# Altium PCB SG2002_work_174.PcbDoc (part 1 of 2)
Units mm, origin at the board's own origin, x right, y up, seen from the top; angles counter-clockwise.
Board outline 38 x 38 mm, 4 copper layers (TOP, GND, POWER, BOTTOM), stack 0.732 mm thick; 197 components, 122 nets, 613 pads, 461 vias.
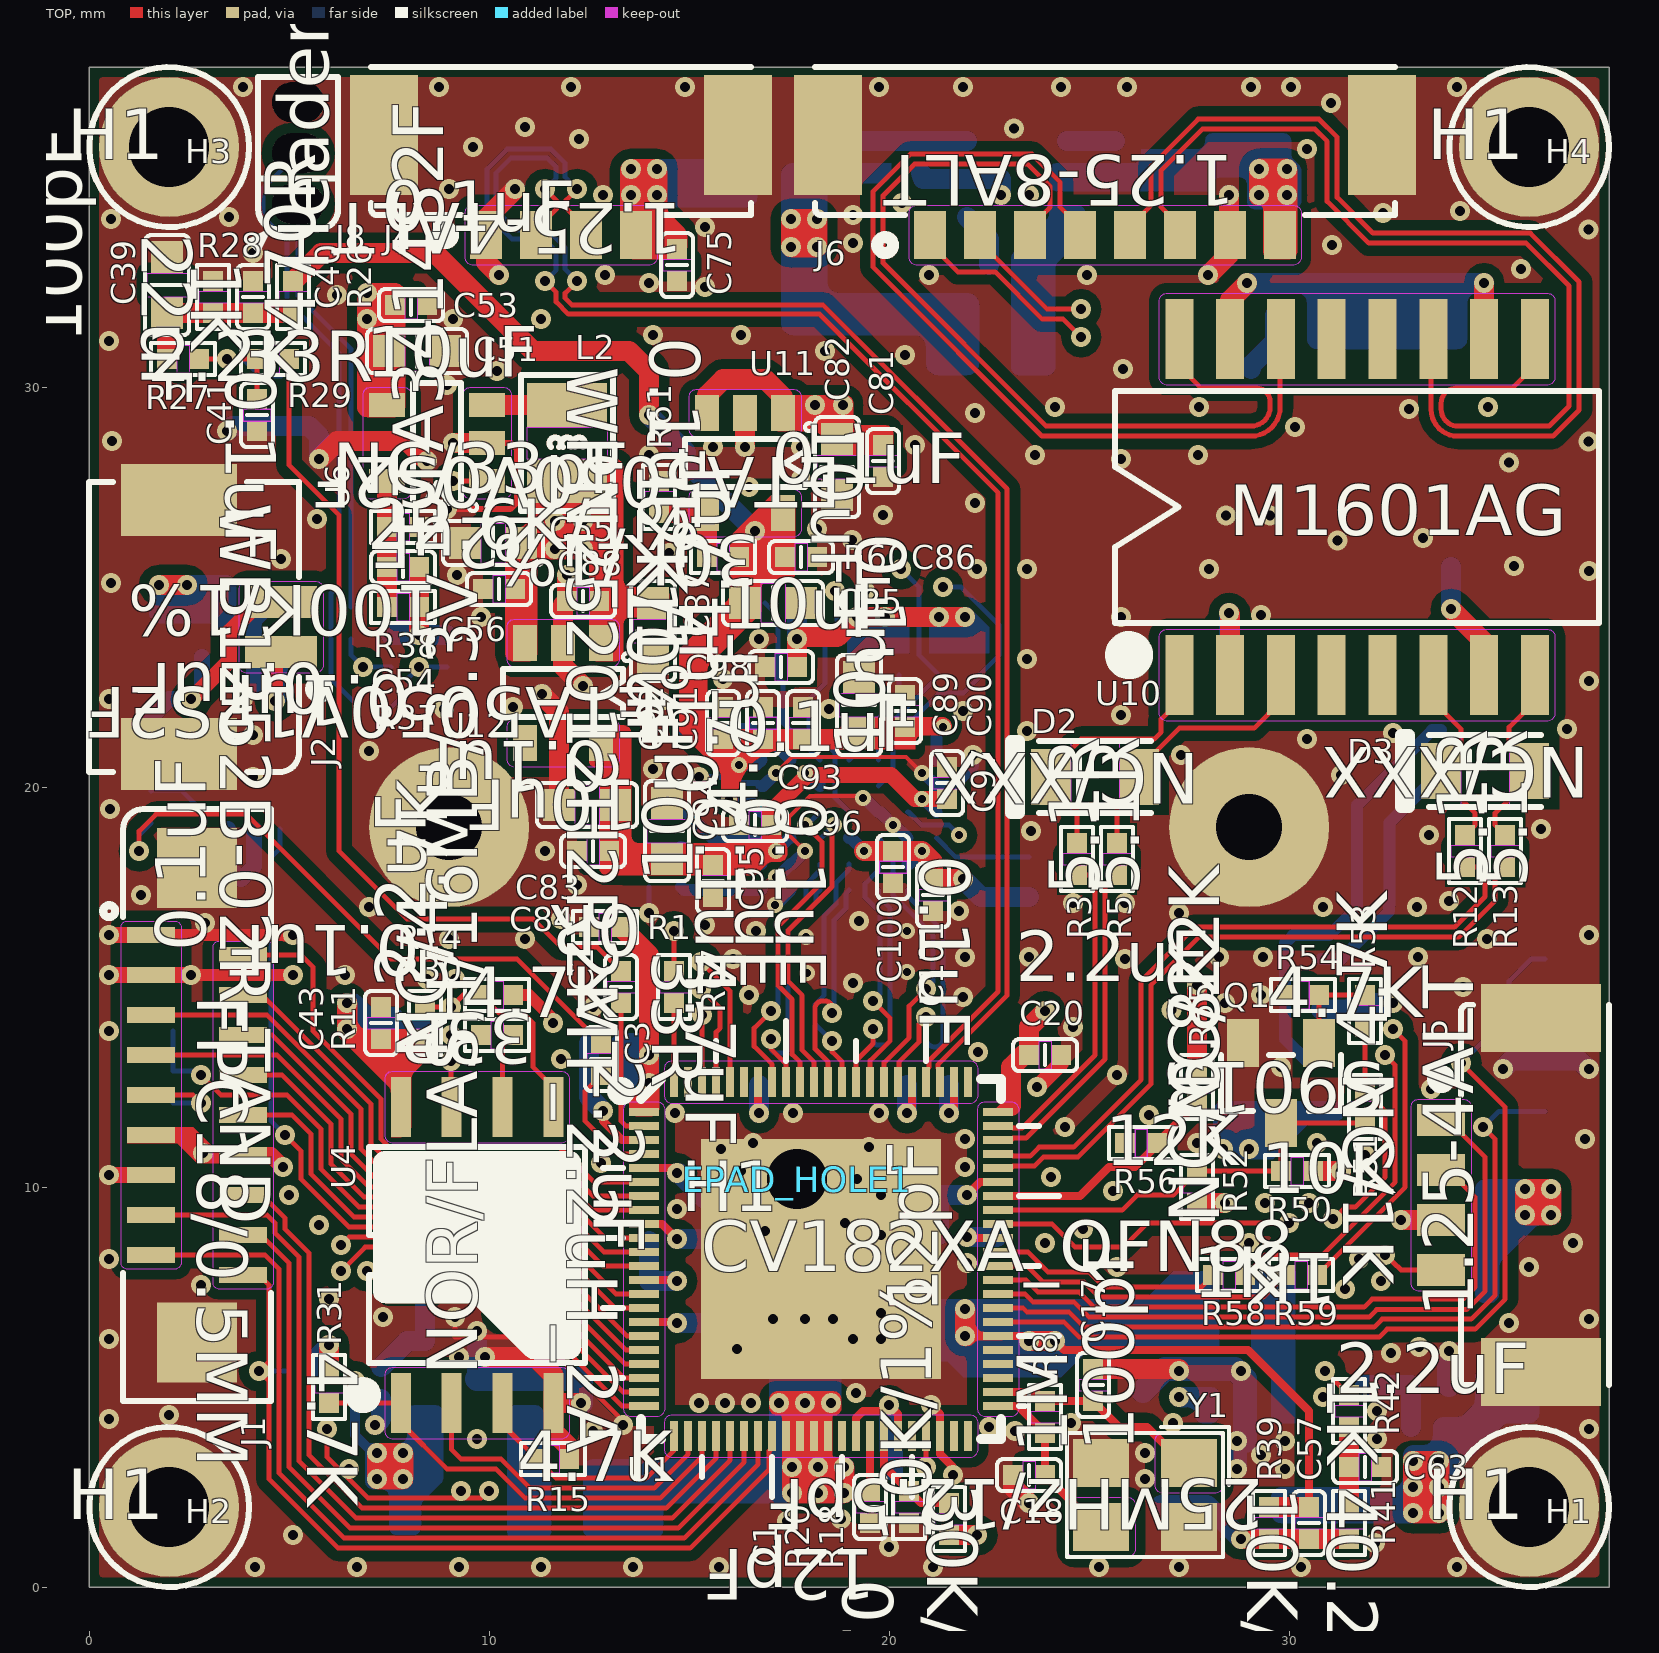
[diagram p0: TOP view]
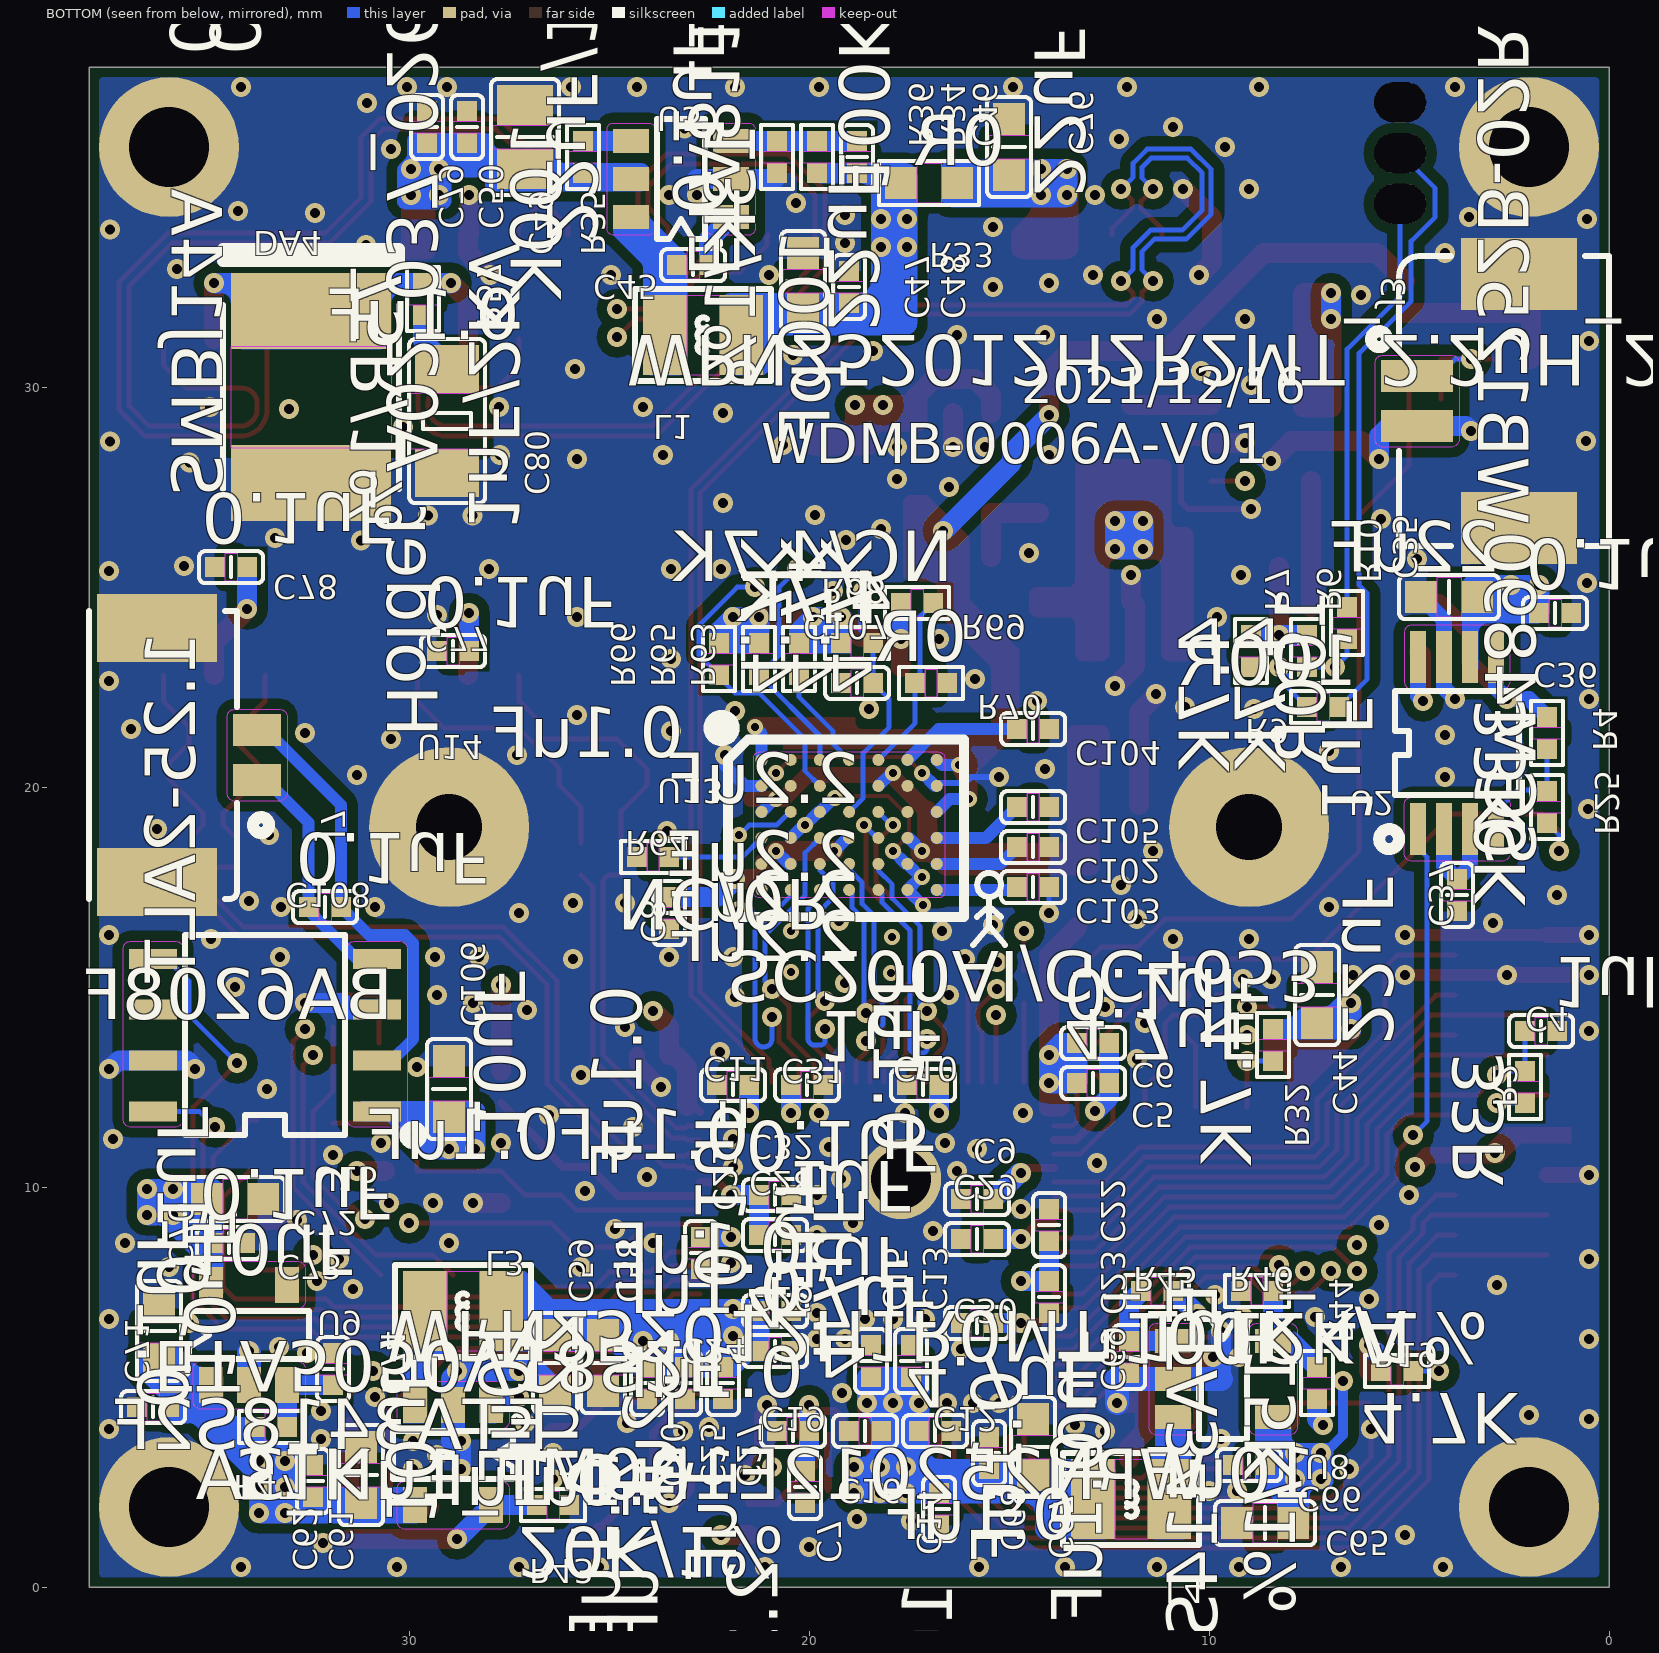
[diagram p1: BOTTOM view, seen from below]
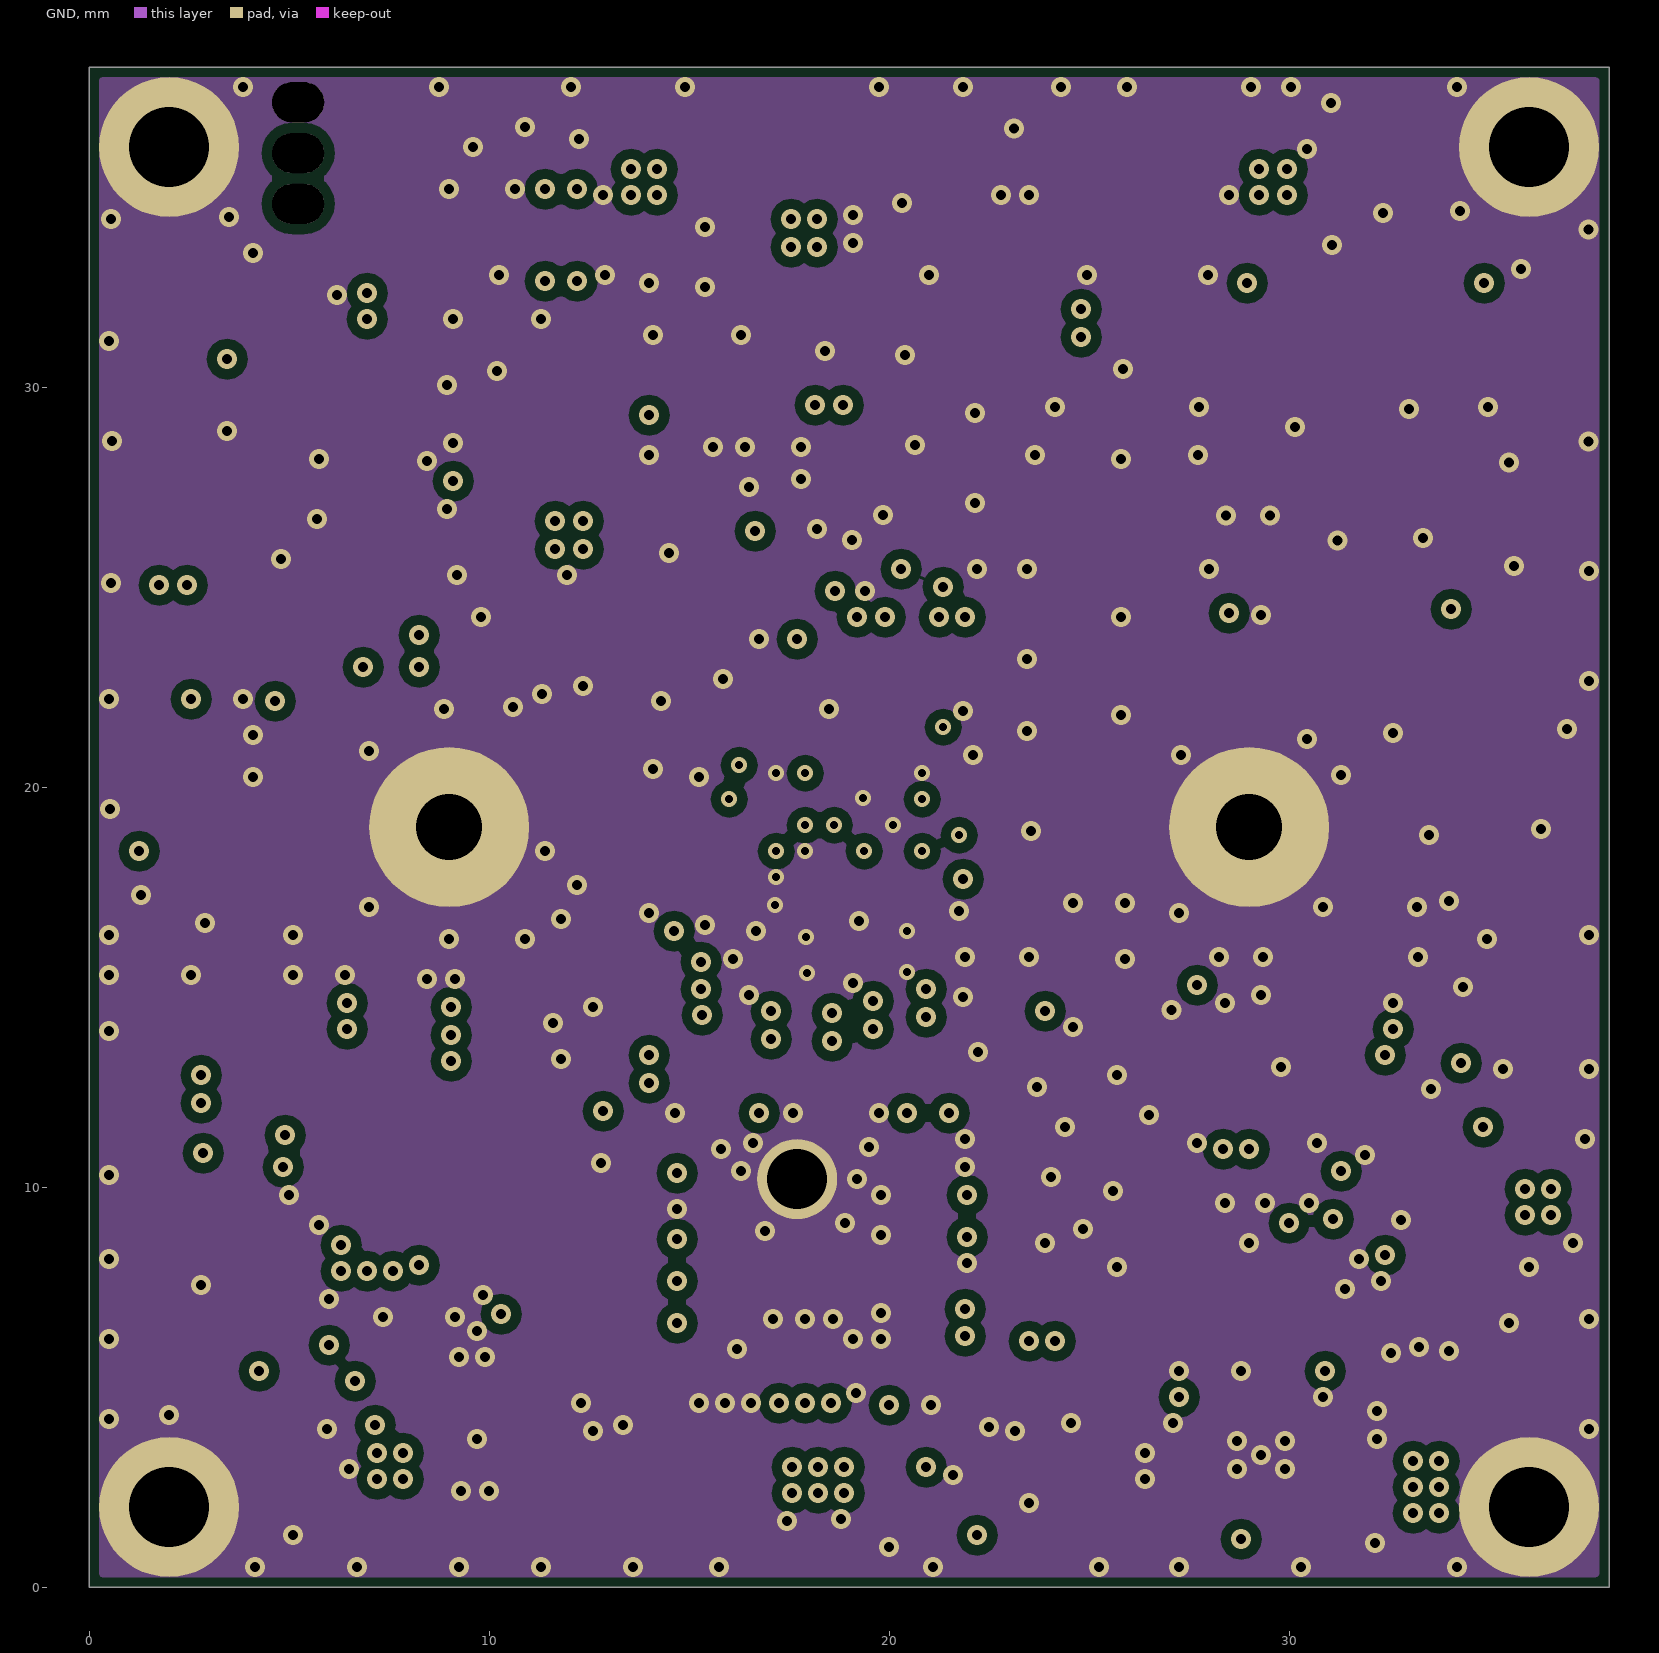
[diagram p2: GND]
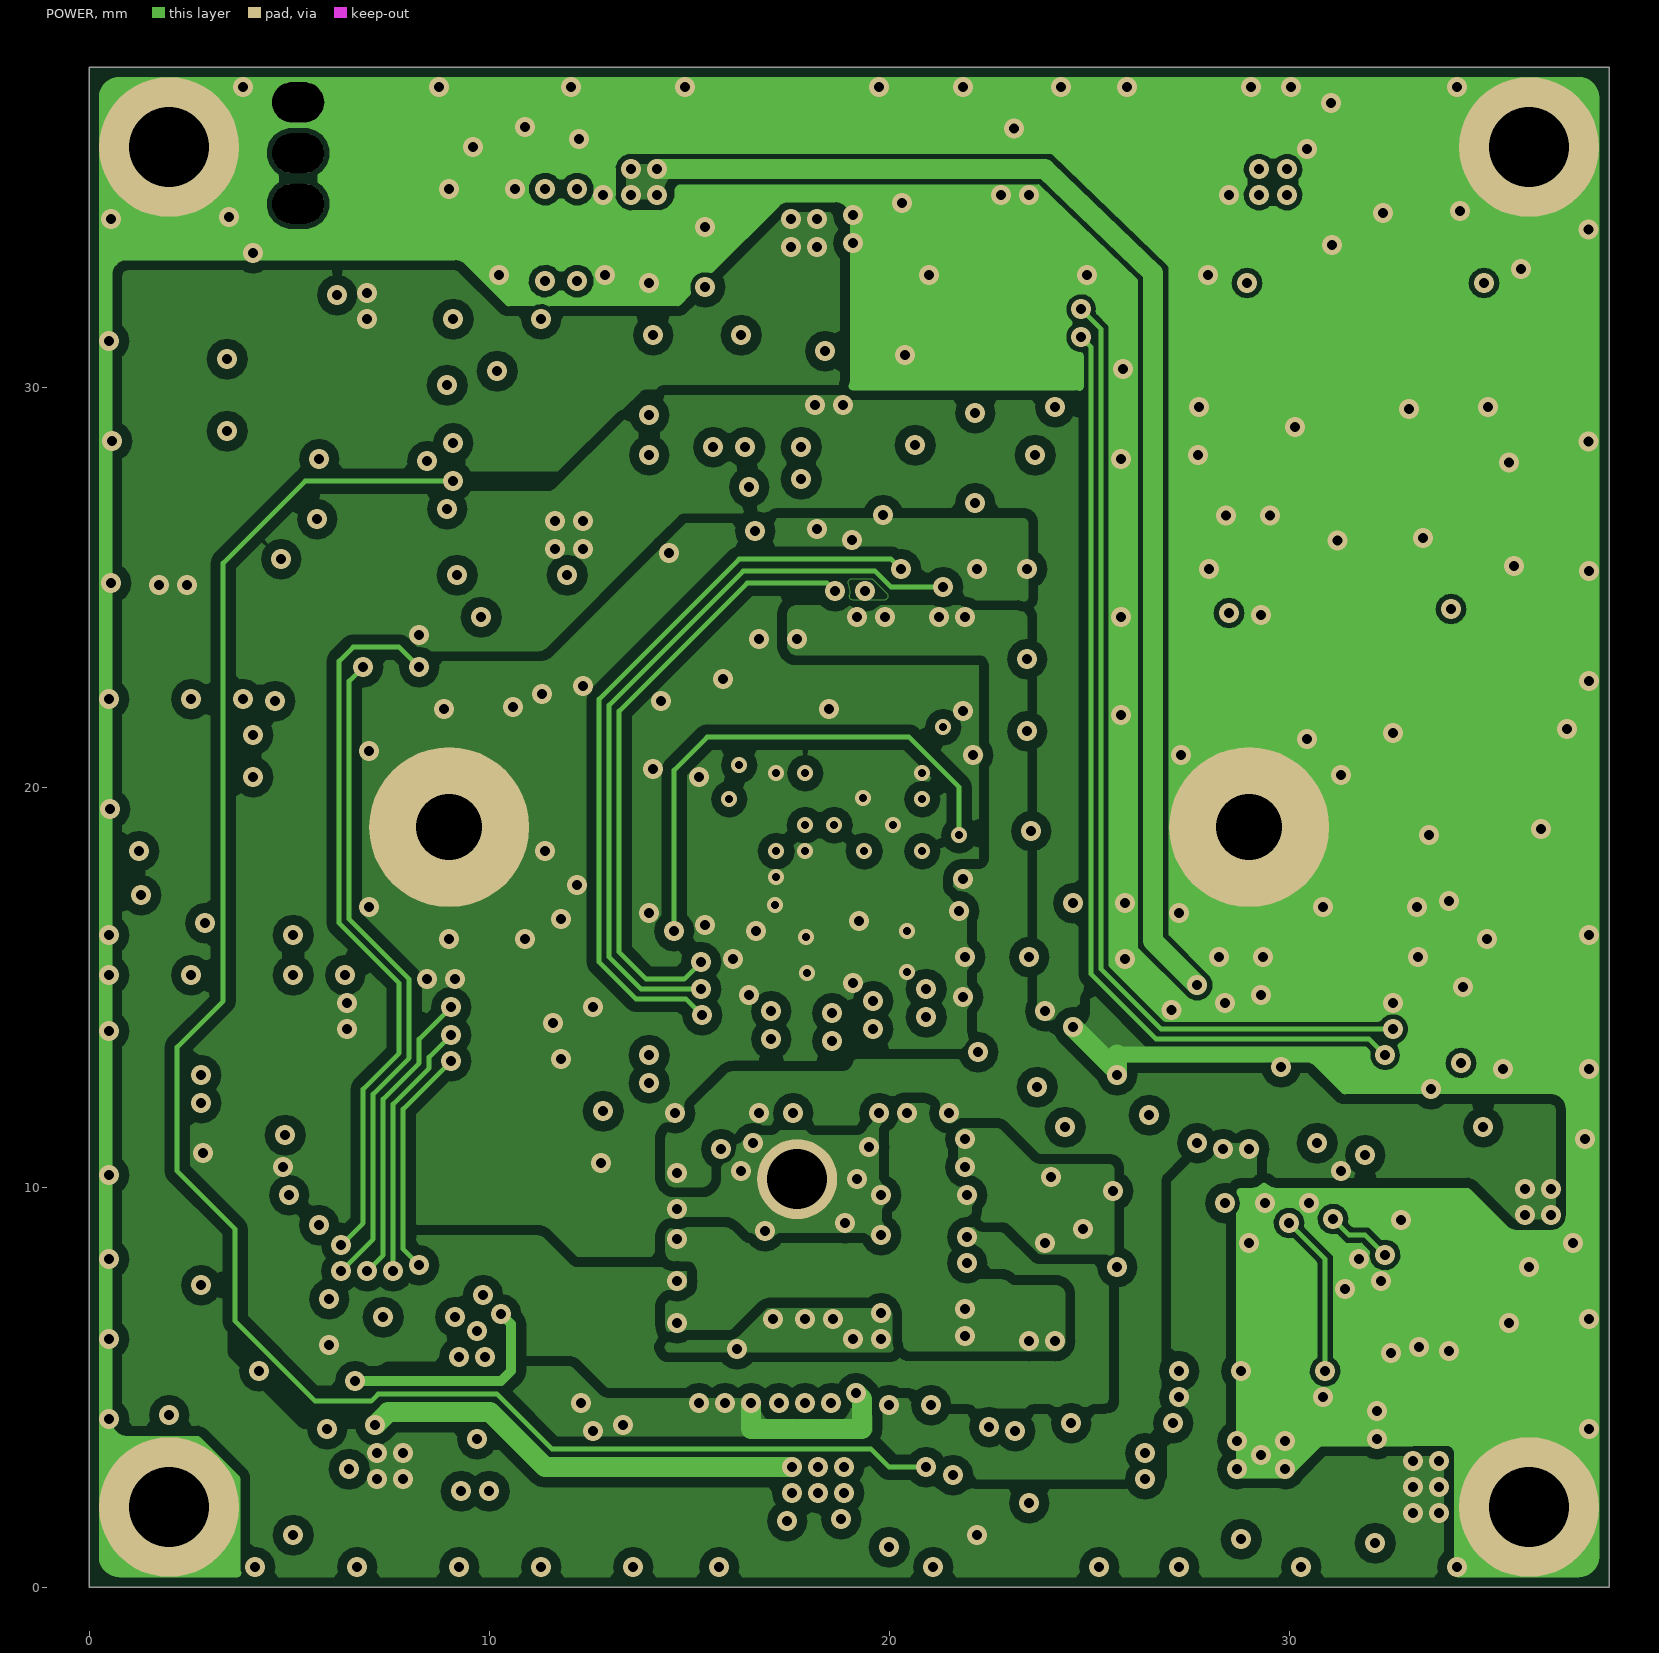
[diagram p3: POWER]

## Layer stack, top to bottom
Top Solder: solder mask 0.0102, Solder Resist, Dk 3.5
TOP: signal copper 0.0305
Dielectric 1: core 0.2032, FR-4, Dk 4.5
GND: signal copper 0.0305
Dielectric2: core 0.2032, FR-4, Dk 4.5
POWER: signal copper 0.0305
Dielectric3: core 0.2032, FR-4, Dk 4.5
BOTTOM: signal copper 0.0305
Bottom Solder: solder mask 0.0102, Solder Resist, Dk 3.5

## Board outline
0,38 0,0 38,0 38,38

## Design rules (kind name [scope] priority, off if disabled: settings)
Clearance [All] p1: gap=0.254 ignorepadtopadclearanceinfootprint=FALSE
DiffPairsRouting [All] p1: maxlimit=0.254 minlimit=0.254 mostfreqgap=0.254 toplayer_minwidth=0.381 toplayer_maxwidth=0.381 toplayer_prefwidth=0.381 midlayer1_minwidth=0.381 midlayer1_maxwidth=0.381 midlayer1_prefwidth=0.381 midlayer2_minwidth=0.381 midlayer2_maxwidth=0.381 midlayer2_prefwidth=0.381 bottomlayer_minwidth=0.381 bottomlayer_maxwidth=0.381 bottomlayer_prefwidth=0.381 maxuncoupledlength=12.7
PlaneConnect [All] p1: planeconnectstyle=Direct reliefexpansion=0.508 reliefentries=4 reliefconductorwidth=0.254 reliefairgap=0.254
PolygonConnect [All] p1: connectstyle=Direct reliefconductorwidth=0.254 reliefentries=4 polygonreliefangle="90 Angle" airgapwidth=0.254
RoutingVias [All] p1: holewidth=0.711 width=1.27 viastyle="Through Hole" minholewidth=0.711 minwidth=1.27 maxholewidth=0.711 maxwidth=1.27
SolderMaskExpansion [All] p1: expansion=0.102 istentingtop=FALSE
Width [All] p1: maxlimit=0.254 minlimit=0.254 preferedwidth=0.254 impedanceprofiledriven=TRUE minimp=60.000000 maximp=60.000000 favimp=60.000000
28 further rules are at their usual default settings.

## Classes and differential pairs
differential pair DP3: +USB_DM -USB_DP
differential pair TX_D: +TX_D- -TX_D+
differential pair RX_D: +RX_D- -RX_D+
differential pair DP2: +N20551631 -N20551633
differential pair DP1: +N20551619 -N20551621
differential pair EPHY_TX: +EPHY_TXN -EPHY_TXP
differential pair EPHY_RX: +EPHY_RXN -EPHY_RXP
differential pair CAM_RX0_CLK: +CAM_RX0_CLKN -CAM_RX0_CLKP
differential pair CAM_RX0_4: +CAM_RX0_4N -CAM_RX0_4P
differential pair CAM_RX0_3: +CAM_RX0_3N -CAM_RX0_3P
differential pair CAM_RX0_1: +CAM_RX0_1N -CAM_RX0_1P
differential pair CAM_RX0_0: +CAM_RX0_0N -CAM_RX0_0P

## Components (designator, comment, footprint, x,y, rotation, side; value= is the part's Value field where it differs from the comment)
C1 "C_C0402_0.1UF" C0402#1 19.525,2 r270 top
C2 "C_C0402_2.2UF" C0402#1 13.3,15 r270 top
C3 "C_C0402_2.2UF" C0402#1 12.8,13.2 r90 top
C4 "C_C0402_1UF" C0402#1 1.7,13.9 r180 bottom
C5 "C_C0402_4.7UF" C0402#1 12.9,12.6 r180 bottom
C6 "C_C0402_0.1UF" C0402#1 12.9,13.6 r180 bottom
C7 "C_C0402_2.2UF" C0402#2 20.1,2.5 r90 bottom
C8 "C_C0402_0.1UF" C0402#2 23.5,16.85 r90 bottom
C9 "C_C0402_0.1UF" C0402#1 15.8,9.7 r0 bottom
C10 "C_C0402_0.1UF" C0402#1 17.15,12.55 r0 bottom
C11 "C_C0402_0.1UF" C0402#1 21.9,12.55 r0 bottom
C12 "C_C0402_4.7UF" C0402#1 16.85,3.9 r180 bottom
C13 "C_C0402_1UF" C0402#2 17.45,5.65 r270 bottom
C14 "C_C0402_1UF" C0402#2 16.75,1.95 r90 bottom
C15 "C_C0402_0.1UF" C0402#2 18.45,5.65 r270 bottom
C16 "C_C0402_0.1UF" C0402#1 18.6,3.9 r0 bottom
C17 "C_C0402_12PF" C0402#1 25.1,5.05 r90 top
C18 "C_C0402_12PF" C0402#1 23.5,2.8 r180 top
C19 "C_C0402_0.1UF" C0402#1 20.4,3.9 r0 bottom
C20 "C_C0402_2.2UF" C0402#1 23.9,13.3 r0 top
C21 "C_C0402_2.2UF" C0402#2 22.7,8.35 r90 bottom
C22 "C_C0402_0.1UF" C0402#2 14,9.05 r270 bottom
C23 "C_C0402_0.1UF" C0402#2 14,7.25 r90 bottom
C24 "C_C0402_4.7UF" C0402#1 20.85,5.9 r180 bottom
C25 "C_C0402_4.7UF" C0402#2 23.1,5.1 r90 bottom
C26 "C_C0402_1UF" C0402#1 20.85,6.9 r180 bottom
C27 "C_C0402_1UF" C0402#2 22.15,5.1 r90 bottom
C28 "C_C0402_1UF" C0402#1 20.85,8.8 r180 bottom
C29 "C_C0402_0.1UF" C0402#1 15.8,8.7 r0 bottom
C30 "C_C0402_0.1UF" C0402#1 15.8,6.6 r0 bottom
C31 "C_C0402_1UF" C0402#1 20.05,12.55 r180 bottom
C32 "C_C0402_0.1UF" C0402#1 20.85,9.8 r180 bottom
C35 "C_C0603_22UF" C0603#1 4,24.75 r0 bottom
C36 "C_C0402_0.1UF" C0402#1 1.35,24.35 r180 bottom
C37 "C_C0402_1UF" C0402#2 3.8,17.3 r270 bottom
C39 "C_C0603_22UF" C0603#1 1.95,32.55 r270 top
C40 "C_C0402_0.1UF" C0402#1 4.1,32.25 r270 top
C41 "C_C0402_100PF" C0402#1 4.2,29.3 r90 top
C43 "C_C0402_0.1UF" C0402#1 7.3,14.1 r90 top
C44 "C_C0603_22UF" C0603#2 7.3,14.8 r270 bottom
C45 "C_C0402_0.1UF" C0402#1 22.9,33.05 r0 bottom
C46 "C_C0402_100PF" C0402#2 18.8,35.75 r90 bottom
C47 "C_C0603_22UF" C0603#2 20.15,32.65 r270 bottom
C48 "C_C0402_0.1UF" C0402#2 19,32.5 r270 bottom
C49 "C_C0805_22UF/16V" C0805 27.1,36.25 r270 bottom
C50 "C_C0402_0.1UF/16V" C0402#2 28.55,36.5 r270 bottom
C51 "C_C0603_10UF" C0603#1 8.2,30.9 r0 top
C53 "C_C0402_0.1UF" C0402#1 8.05,32.05 r0 top
C54 "C_C0402_NC/33PF" C0402#1 7.85,25.5 r0 top
C55 "C_C0603_22UF" C0603#1 10.1,26.1 r180 top
C56 "C_C0402_0.1UF" C0402#1 10.25,24.95 r180 top
C57 "C_C0402_100PF" C0402#1 30.5,1.6 r90 top
C58 "C_C0603_22UF" C0603#2 25.15,5.6 r90 bottom
C59 "C_C0603_10UF" C0603#2 26.35,5.6 r90 bottom
C60 "C_C0402_0.1UF" C0402#2 24.05,5.1 r90 bottom
C61 "C_C0603_10UF" C0603#2 31.2,2.8 r270 bottom
C62 "C_C0402_0.1UF" C0402#2 32.4,2.65 r270 bottom
C63 "C_C0402_2.2UF" C0402#1 31.9,3 r0 top
C65 "C_C0603_10UF" C0603#1 8.6,1.6 r0 bottom
C66 "C_C0402_0.1UF" C0402#1 9,3.05 r0 bottom
C67 "C_C0603_10UF" C0603#2 14.4,3.5 r270 bottom
C68 "C_C0402_4.7UF" C0402#2 15.5,3.35 r270 bottom
C69 "C_C0402_0.1UF" C0402#2 12,5.75 r90 bottom
C70 "C_C0603_10UF" C0603#2 36.25,6.4 r270 bottom
C71 "C_C0402_0.1UF" C0402#1 36.4,4.5 r0 bottom
C72 "C_C0603_10UF" C0603#1 34.35,9.7 r180 bottom
C73 "C_C0402_0.1UF" C0402#1 34.5,8.6 r180 bottom
C74 "C_C0402_0.1UF" C0402#2 31.9,5.45 r270 bottom
C75 "C_C0402_0.1UF" C0402#1 14.7,33.05 r270 top
C76 "C_C0603_22UF" C0603#2 15,36 r270 bottom
C77 "C_C0402_0.1UF" C0402#1 28.9,23.4 r180 bottom
C78 "C_C0402_0.1UF" C0402#1 34.45,25.5 r180 bottom
C79 "C_C0402_0.1UF/16V" C0402#2 29.55,36.5 r270 bottom
C80 "C_C1206_1NF/2KV" C1206 29.05,29.15 r270 bottom
C81 "C_C0402_0.1UF" C0402#1 19.85,28.15 r270 top
C82 "C_C0603_10UF" C0603#1 18.7,28 r270 top
C83 "C_C0603_10UF" C0603#1 12.45,19.55 r180 top
C84 "C_C0402_0.1UF" C0402#1 12.6,18.4 r180 top
C85 "C_C0603_10UF" C0603#1 17.1,24.6 r0 top
C86 "C_C0402_0.1UF" C0402#1 17.8,25.75 r0 top
C87 "C_C0603_10UF" C0603#1 14.1,23.9 r270 top
C88 "C_C0402_0.1UF" C0402#1 12.35,24.65 r180 top
C89 "C_C0603_10UF" C0603#1 19.25,22.05 r90 top
C90 "C_C0402_4.7UF" C0402#1 20.4,21.9 r90 top
C91 "C_C0402_0.1UF" C0402#1 16.85,21.6 r270 top
C92 "C_C0402_0.1UF" C0402#1 15.85,21.6 r270 top
C93 "C_C0402_0.1UF" C0402#1 17.85,21.6 r270 top
C94 "C_C0603_10UF" C0603#1 14.45,18.9 r90 top
C95 "C_C0402_4.7UF" C0402#1 15.6,17.65 r270 top
C96 "C_C0402_0.1UF" C0402#1 16.65,19.05 r0 top
C97 "C_C0402_0.1UF" C0402#1 21.45,20.1 r270 top
C98 "C_C0402_0.1UF" C0402#1 17.3,23 r180 top
C100 "C_C0402_0.1UF" C0402#1 20.1,18 r90 top
C101 "C_C0402_4.7UF" C0402#1 21.1,17.3 r90 top
C102 "C_C0402_2.2UF" C0402#1 14.4,18.5 r0 bottom
C103 "C_C0402_2.2UF" C0402#1 14.4,17.5 r0 bottom
C104 "C_C0402_2.2UF" C0402#1 14.4,21.45 r0 bottom
C105 "C_C0402_2.2UF" C0402#1 14.4,19.5 r0 bottom
C106 "C_C0603_10UF" C0603#2 29,12.45 r270 bottom
C107 "C_C0402_0.1UF" C0402#1 18.8,22.6 r0 bottom
C108 "C_C0402_0.1UF" C0402#1 32.1,17 r180 bottom
D2 "D_0_SOD323_1D4X1D8_NC/XXX" SOD323_1D4X1D8 25.15,20.25 r180 top
D3 "D_0_SOD323_1D4X1D8_NC/XXX" SOD323_1D4X1D8 34.9,20.4 r180 top
DA4 "DIODE SCHOTTKY_0_D_SMB_5D6X4D0_" D_SMB_5D6X4D0 32.45,29.75 r270 bottom
EPAD_HOLE1 "H_M_1D5_2D0_H1" M_1D5_2D0 17.7,10.2 r0 top
H1 "H_M_2D0_3D5_H1" M_2D0_3D5 36,2 r0 top
H2 "H_M_2D0_3D5_H1" M_2D0_3D5 2,2 r0 top
H3 "H_M_2D0_3D5_H1" M_2D0_3D5 2,36 r0 top
H4 "H_M_2D0_3D5_H1" M_2D0_3D5 36,36 r0 top
J1 "CON12_0_FPC18_3D5X14D6_1D0_FPC1" FPC18_3D5X14D6_1D0 2.7,12.05 r270 top
J2 "CON6_5_WF2_4D4X7D25_1D25_SMD_L_" WF2_4D4X7D25_1D25_SMD_L#1 2.2,24 r270 top
J3 "CON6_5_WF2_4D4X7D25_1D25_SMD_L_" WF2_4D4X7D25_1D25_SMD_L#2 2.2,29.65 r270 bottom
J4 "CON6_6_WF4_3D5X9D5_1D25_SMD_L_1" WF4_3D5X9D5_1D25_SMD_L 11.8,36.05 r180 top
J5 "CON6_6_WF4_3D5X9D5_1D25_SMD_L_1" WF4_3D5X9D5_1D25_SMD_L 36.05,9.8 r90 top
J6 "CON6_2_WF8_3D5X14D5_1D25_SMD_L_" WF8_3D5X14D5_1D25_SMD_L 25.4,36.05 r180 top
J7 "CON2_1_WF2_3D5X7D0_1D25_SMD_L_1" WF2_3D5X7D0_1D25_SMD_L 36.05,20.8 r90 bottom
J8 "HEADER 3X1_0.25MM_JMP_1X3_1D27_" JMP_1X3_1D27 5.225,35.85 r90 top
L1 "L_L1008_WPN252012H2R2MT_2.2UH_2" L1008 22.65,31.3 r180 bottom
L2 "L_L1008_WPN252012H2R2MT_2.2UH_2" L1008 11.95,28.6 r270 top
L3 "L_L1008_WPN252012H1R0MT_1UH_4A" L1008 28.65,6.9 r180 bottom
L4 "L_L1008_WPN252012E1R0MT_1UH_3A" L1008 11.95,2.2 r0 bottom
Q1 "2N1069_4_SOT23_BEC_S9013" SOT23_BEC 29.8,12.6 r180 top
R1 "R_R0402_0R" R0402#1 12.9,16.5 r180 top
R2 "R_R0402_33R" R0402#2 2.1,12.5 r90 bottom
R3 "R_R0402_5.1R" R0402#1 24.7,18.2 r90 top
R4 "R_R0402_33K" R0402#2 1.55,21.35 r90 bottom
R5 "R_R0402_5.1R" R0402#1 25.7,18.2 r90 top
R6 "R_R0402_4.7K" R0402#2 7.55,23.4 r90 bottom
R7 "R_R0402_4.7K" R0402#2 8.95,23.4 r90 bottom
R8 "R_R0402_1M" R0402#1 23.9,4.25 r90 top
R9 "R_R0402_100R" R0402#1 7.15,22 r0 bottom
R10 "R_R0402_100R" R0402#2 6.55,24.1 r90 bottom
R11 "R_R0402_NC/4.7K" R0402#1 8.4,14.1 r90 top
R12 "R_R0402_5.1R" R0402#1 34.4,18.4 r90 top
R13 "R_R0402_5.1R" R0402#1 35.4,18.4 r90 top
R14 "R_R0402_4.7K" R0402#1 10.2,14.8 r0 top
R15 "R_R0402_4.7K" R0402#1 11.6,3.2 r0 top
R18 "R_R0402_30K/1%" R0402#1 21.5,1.7 r270 top
R19 "R_R0402_4.7K" R0402#1 5.3,5.4 r180 bottom
R20 "R_R0402_10K/1%" R0402#1 20.5,2 r90 top
R25 "R_R0402_10K" R0402#2 1.55,19.5 r90 bottom
R26 "R_R0402_470R" R0402#1 5.1,32.25 r90 top
R27 "R_R0402_2.2K" R0402#1 2.35,30.7 r0 top
R28 "R_R0402_1K" R0402#1 3.1,32.25 r270 top
R29 "R_R0402_33R" R0402#1 4.6,30.7 r0 top
R30 "R_R0402_33R" R0402#1 10.2,13.8 r180 top
R31 "R_R0402_4.7K" R0402#1 6,5 r270 top
R32 "R_R0402_4.7K" R0402#2 8.4,13.55 r90 bottom
R33 "R_R0603_0R" R0603 17,35.1 r0 bottom
R34 "R_R0402_100K/1%" R0402#2 19.8,35.75 r270 bottom
R35 "R_R0402_100K" R0402#2 25.65,35.75 r90 bottom
R36 "R_R0402_13K/1%" R0402#2 20.8,35.75 r90 bottom
R37 "R_R0402_100K/1%" R0402#1 7.85,24.5 r180 top
R38 "R_R0402_22.6K/1%" R0402#1 7.85,26.5 r0 top
R39 "R_R0402_10K/1%" R0402#1 29.5,1.6 r270 top
R41 "R_R0402_40.2K/1%" R0402#1 31.5,1.6 r270 top
R42 "R_R0402_1K" R0402#1 31.5,4.4 r270 top
R43 "R_R0402_20K/1%" R0402#1 26.4,2.05 r180 bottom
R44 "R_R0402_15K/1%" R0402#2 7.3,5.1 r90 bottom
R45 "R_R0402_100K" R0402#1 11.3,7.4 r180 bottom
R46 "R_R0402_12K/1%" R0402#1 8.8,7.4 r180 bottom
R47 "R_R0402_51K" R0402#1 33.45,4 r180 bottom
R50 "R_R0402_10K" R0402#1 30.2,10.4 r0 top
R51 "R_R0402_NC/1K" R0402#1 31.9,12 r270 top
R52 "R_R0402_NC/6.8K" R0402#1 27.7,10 r90 top
R53 "R_R0402_4.7K" R0402#1 31.9,14.4 r90 top
R54 "R_R0402_4.7K" R0402#1 30.35,14.8 r0 top
R55 "R_R0402_NC/22K" R0402#1 27.7,12.5 r90 top
R56 "R_R0402_12K" R0402#1 26.3,11.1 r0 top
R57 "R_R0402_75R/1%" R0402#2 29.65,32.2 r90 bottom
R58 "R_R0402_1K" R0402#1 28.5,7.8 r0 top
R59 "R_R0402_1K" R0402#1 30.3,7.8 r180 top
R60 "R_R0402_30K/1%" R0402#1 15.85,25.75 r180 top
R61 "R_R0402_12K/1%" R0402#1 14.25,27.25 r270 top
R63 "R_R0402_4.7K" R0402#2 20.25,23.2 r270 bottom
R64 "R_R0402_NC/0R" R0402#1 23.9,18.25 r180 bottom
R65 "R_R0402_4.7K" R0402#2 21.25,23.2 r270 bottom
R66 "R_R0402_4.7K" R0402#2 22.25,23.2 r270 bottom
R67 "R_R0402_33R" R0402#1 14.625,15 r270 top
R68 "R_R0402_4.7K" R0402#1 18.8,23.6 r0 bottom
R69 "R_R0402_NC/4.7K" R0402#1 17.3,24.6 r0 bottom
R70 "R_R0402_0R" R0402#1 16.95,22.6 r0 bottom
U1 "MARS_CV182X_QFN88_QFN88_9D0X9D0" QFN88_9D0X9D0_0D35_E 18.3,8.2 r0 top
U2 "SGM4890YMS_MSOP8_3D0X3D0_0D65_S" MSOP8_3D0X3D0_0D65 3.8,21.1 r270 bottom
U4 "ESMT_SPINOR_WSON8_5_SOP8_5D28X5" SOP8_5D28X5D28_1D27 9.7,8.3 r90 top
U5 "G2832TB1U_0_SOT236_2D9X1D6_0D95" SOT236_2D9X1D6_0D95 23.2,35.2 r270 bottom
U6 "G2822T11U_0_SOT235_2D9X1D6_0D95" SOT235_2D9X1D6_0D95#1 8.7,28.6 r90 top
U7 "G2822T11U_0_SOT235_2D9X1D6_0D_1" SOT235_2D9X1D6_0D95#1 28.9,3.3 r0 bottom
U8 "G2822T11U_0_SOT235_2D9X1D6_0D95" SOT235_2D9X1D6_0D95#2 9.65,5.2 r90 bottom
U9 "G9091-180T11U_SOT235_2D9X1D6__1" SOT235_2D9X1D6_0D95#1 34,6.3 r180 bottom
U10 "M1601AG_TF16_12D1X5D1_1D27_M160" TF16_12D1X5D1_1D27 31.7,27 r0 top
U11 "LDO-PT5108/RT9013_2_SOT235_2D9X" SOT235_2D9X1D6_0D95#1 16.4,28.1 r180 top
U12 "G9091-180T11U_SOT235_2D9X1D6_0D" SOT235_2D9X1D6_0D95#1 11.85,22.35 r180 top
U13 "IMX327LQR-C_1_CSP41_4D438X5D896" CSP41_4D438X5D896_0D65_0D73 19.08,18.973 r180 bottom
U14 "CAM_HOLDER_LENS_IR_24D0X17_20D0" LENS_IR_24D0X17_20D0 19,19 r270 bottom
U15 "BA6208F_1_SOP8_4D4X5D0_1D27_BA6" SOP8_4D4X5D0_1D27 33.6,13.8 r0 bottom
Y1 "XTAL_25MHZ_7_XTAL_3D2X2D5_25MHZ" XTAL_3D2X2D5 26.4,2.3 r180 top

## Footprints (in the part's own frame and the unit in brackets; to place one, negate y for a bottom-side part, rotate by r counter-clockwise, add the part's x,y. Pads: shape width x height; smd on the part's side, far side on the other; paste and mask are expansions set on the pad)
C0402#1 [mm] "C0402"
  rect 0.5x0.5 smd: 1(-0.4,0) 2(0.4,0)
  TOP keep-out region: -0.15,0.35 0.15,0.35 0.15,-0.35 -0.15,-0.35
  silkscreen extent -0.8,-0.4 0.8,0.4, body extent -0.65,-0.25 0.65,0.25, height 3.81
C0402#2 [mm] "C0402"
  rect 0.5x0.5 smd: 1(0.4,0) 2(-0.4,0)
  TOP keep-out region: 0.15,-0.35 -0.15,-0.35 -0.15,0.35 0.15,0.35
  silkscreen extent -0.8,-0.4 0.8,0.4, body extent -0.65,-0.25 0.65,0.25, height 3.81
C0603#1 [mm] "C0603"
  rect 0.8x0.8 smd: 1(-0.7,0) 2(0.7,0)
  TOP keep-out region: -0.3,0.5 0.3,0.5 0.3,-0.5 -0.3,-0.5
  silkscreen extent -1.25,-0.55 1.25,0.55, body extent -1.1,-0.4 1.1,0.4, height 3.81
C0603#2 [mm] "C0603"
  rect 0.8x0.8 smd: 1(0.7,0) 2(-0.7,0)
  TOP keep-out region: 0.3,-0.5 -0.3,-0.5 -0.3,0.5 0.3,0.5
  silkscreen extent -1.25,-0.55 1.25,0.55, body extent -1.1,-0.4 1.1,0.4, height 3.81
C0805 [mm] "C0805"
  rect 1x1.4 smd: 1(0.8,0) 2(-0.8,0)
  TOP keep-out region: 0.3,-0.8 -0.3,-0.8 -0.3,0.8 0.3,0.8
  silkscreen extent -1.45,-0.85 1.45,0.85, body extent -1.3,-0.7 1.3,0.7, height 3.81
C1206 [mm] "C1206"
  rect 1.2x1.6 smd: 1(1.3,0) 2(-1.3,0)
  TOP keep-out region: 0.7,-0.9 -0.7,-0.9 -0.7,0.9 0.7,0.9
  silkscreen extent -2.05,-0.95 2.05,0.95, body extent -1.6,-0.8 1.6,0.8, height 3.81
CSP41_4D438X5D896_0D65_0D73 [mm] "CSP41_4D438X5D896_0D65_0D73"
  round 0.3 smd: A1(-2.11,1.707) A2(-1.38,1.707) A3(-0.65,1.707) A4(0.08,1.707) A5(0.81,1.707) A6(1.54,1.707) A7(2.27,1.707) B1(-2.11,1.057) B2(-1.38,1.057) B3(-0.65,1.057) B5(0.81,1.057) B6(1.54,1.057) B7(2.27,1.057) C1(-2.11,0.407) C2(-1.38,0.407) C3(-0.65,0.407) C4(0.08,0.407) C5(0.81,0.407) C6(1.54,0.407) C7(2.27,0.407) D1(-2.11,-0.243) D2(-1.38,-0.243) D3(-0.65,-0.243) D4(0.08,-0.243) D5(0.81,-0.243) D6(1.54,-0.243) D7(2.27,-0.243) E1(-2.11,-0.893) E2(-1.38,-0.893) E3(-0.65,-0.893) E4(0.08,-0.893) E5(0.81,-0.893) E6(1.54,-0.893) E7(2.27,-0.893) F1(-2.11,-1.543) F2(-1.38,-1.543) F3(-0.65,-1.543) F4(0.08,-1.543) F5(0.81,-1.543) F6(1.54,-1.543) F7(2.27,-1.543)
  TOP keep-out region: -2.31,1.757 -2.299,1.814 -2.266,1.863 -2.217,1.895 -2.16,1.907 -2.16,1.907 2.32,1.907 2.377,1.895 2.426,1.863 2.459,1.814 2.47,1.757 2.47,1.757 2.47,-1.593 2.459,-1.651 2.426,-1.699 2.377,-1.732 2.32,-1.743 2.32,-1.743 -2.16,-1.743 -2.217,-1.732 -2.266,-1.699 -2.299,-1.651 -2.31,-1.593 -2.31,-1.593
  silkscreen extent -3.31,-2.92 3.98,2.71, body extent -2.95,-2.22 2.95,2.22, height 3.81
D_SMB_5D6X4D0 [mm] "D_SMB_5D6X4D0"
  rect 1.9x4 smd: N(-2.15,0) P(2.15,0)
  TOP keep-out region: 1.275,-2 -1.275,-2 -1.275,2 1.275,2
  silkscreen extent -3.7,-2.2 2.3,2.2, body extent -2.8,-2 2.8,2, height 3.81
FPC18_3D5X14D6_1D0 [mm] "FPC18_3D5X14D6_1D0"
  rect 0.4x1.2 smd: 1(-4.25,-1.15) 2(-3.75,1.15) 3(-3.25,-1.15) 4(-2.75,1.15) 5(-2.25,-1.15) 6(-1.75,1.15) 7(-1.25,-1.15) 8(-0.75,1.15) 9(-0.25,-1.15) 10(0.25,1.15) 11(0.75,-1.15) 12(1.25,1.15) 13(1.75,-1.15) 14(2.25,1.15) 15(2.75,-1.15) 16(3.25,1.15) 17(3.75,-1.15) 18(4.25,1.15)
  rect 2x2 smd: 19(-5.93,0) 20(5.93,0)
  TOP keep-out region: -4.1,1.75 -4.089,1.807 -4.056,1.856 -4.007,1.889 -3.95,1.9 -3.95,1.9 4.45,1.9 4.507,1.889 4.556,1.856 4.589,1.807 4.6,1.75 4.6,1.75 4.6,0.55 4.589,0.493 4.556,0.444 4.507,0.411 4.45,0.4 4.45,0.4 -3.95,0.4 -4.007,0.411 -4.056,0.444 -4.089,0.493 -4.1,0.55 -4.1,0.55
  TOP keep-out region: -4.6,-0.55 -4.589,-0.493 -4.556,-0.444 -4.507,-0.411 -4.45,-0.4 -4.45,-0.4 3.95,-0.4 4.007,-0.411 4.056,-0.444 4.089,-0.493 4.1,-0.55 4.1,-0.55 4.1,-1.75 4.089,-1.807 4.056,-1.856 4.007,-1.889 3.95,-1.9 3.95,-1.9 -4.45,-1.9 -4.507,-1.889 -4.556,-1.856 -4.589,-1.807 -4.6,-1.75 -4.6,-1.75
  silkscreen extent -7.4,-2.35 7.4,1.85, body extent -7.3,-1.75 7.3,1.75, height 3.81
JMP_1X3_1D27 [mm] "JMP_1X3_1D27"
  oval 1x1.3 hole 1 slot 1.3 at 90 deg: 1(-1.27,0) 2(0,0) 3(1.27,0)
  silkscreen extent -2.4,-1 1.91,1.2, body extent -1.91,-1 1.91,1, height 3.81
L1008 [mm] "L1008"
  rect 1.1x2 smd: 1(-0.95,0) 2(0.95,0)
  TOP keep-out region: -0.4,1 0.4,1 0.4,-1 -0.4,-1
  silkscreen extent -1.7,-1.15 1.7,1.15, body extent -1.25,-1 1.25,1, height 3.81
LENS_IR_24D0X17_20D0 [mm] "LENS_IR_24D0X17_20D0"
  round 4 hole 1.65: 1(0,-10) 2(0,10)
  body extent -8.5,-12 8.5,12, height 3.81
M_1D5_2D0 [mm] "M_1D5_2D0"
  round 2 hole 1.5: 1(0,0)
  body extent -1.01,-1.01 1.01,1.01, height 3.81
M_2D0_3D5 [mm] "M_2D0_3D5"
  round 3.5 hole 2: 1(0,0)
  silkscreen extent -2,-2 2,2, body extent -1.76,-1.76 1.76,1.76, height 3.81
MSOP8_3D0X3D0_0D65 [mm] "MSOP8_3D0X3D0_0D65"
  rect 1.3x0.4 smd: 1(2.15,-0.975) 2(2.15,-0.325) 3(2.15,0.325) 4(2.15,0.975) 5(-2.15,0.975) 6(-2.15,0.325) 7(-2.15,-0.325) 8(-2.15,-0.975)
  TOP keep-out region: 2.95,-1.125 2.935,-1.202 2.891,-1.266 2.827,-1.31 2.75,-1.325 2.75,-1.325 1.55,-1.325 1.473,-1.31 1.409,-1.266 1.365,-1.202 1.35,-1.125 1.35,-1.125 1.35,1.125 1.365,1.202 1.409,1.266 1.473,1.31 1.55,1.325 1.55,1.325 2.75,1.325 2.827,1.31 2.891,1.266 2.935,1.202 2.95,1.125 2.95,1.125
  TOP keep-out region: -2.95,-1.125 -2.935,-1.202 -2.891,-1.266 -2.827,-1.31 -2.75,-1.325 -2.75,-1.325 -1.55,-1.325 -1.473,-1.31 -1.409,-1.266 -1.365,-1.202 -1.35,-1.125 -1.35,-1.125 -1.35,1.125 -1.365,1.202 -1.409,1.266 -1.473,1.31 -1.55,1.325 -1.55,1.325 -2.75,1.325 -2.827,1.31 -2.891,1.266 -2.935,1.202 -2.95,1.125 -2.95,1.125
  silkscreen extent -1.3,-1.95 2.65,1.55, body extent -1.55,-1.55 1.55,1.55, height 3.81
QFN88_9D0X9D0_0D35_E [mm] "QFN88_9D0X9D0_0D35_E"
  rect 0.75x0.2 smd: 1(-4.425,3.675) 2(-4.425,3.325) 3(-4.425,2.975) 4(-4.425,2.625) 5(-4.425,2.275) 6(-4.425,1.925) 7(-4.425,1.575) 8(-4.425,1.225) 9(-4.425,0.875) 10(-4.425,0.525) 11(-4.425,0.175) 12(-4.425,-0.175) 13(-4.425,-0.525) 14(-4.425,-0.875) 15(-4.425,-1.225) 16(-4.425,-1.575) 17(-4.425,-1.925) 18(-4.425,-2.275) 19(-4.425,-2.625) 20(-4.425,-2.975) 21(-4.425,-3.325) 22(-4.425,-3.675) 45(4.425,-3.675) 46(4.425,-3.325) 47(4.425,-2.975) 48(4.425,-2.625) 49(4.425,-2.275) 50(4.425,-1.925) 51(4.425,-1.575) 52(4.425,-1.225) 53(4.425,-0.875) 54(4.425,-0.525) 55(4.425,-0.175) 56(4.425,0.175) 57(4.425,0.525) 58(4.425,0.875) 59(4.425,1.225) 60(4.425,1.575) 61(4.425,1.925) 62(4.425,2.275) 63(4.425,2.625) 64(4.425,2.975) 65(4.425,3.325) 66(4.425,3.675)
  rect 0.2x0.75 smd: 23(-3.675,-4.425) 24(-3.325,-4.425) 25(-2.975,-4.425) 26(-2.625,-4.425) 27(-2.275,-4.425) 28(-1.925,-4.425) 29(-1.575,-4.425) 30(-1.225,-4.425) 31(-0.875,-4.425) 32(-0.525,-4.425) 33(-0.175,-4.425) 34(0.175,-4.425) 35(0.525,-4.425) 36(0.875,-4.425) 37(1.225,-4.425) 38(1.575,-4.425) 39(1.925,-4.425) 40(2.275,-4.425) 41(2.625,-4.425) 42(2.975,-4.425) 43(3.325,-4.425) 44(3.675,-4.425) 67(3.675,4.425) 68(3.325,4.425) 69(2.975,4.425) 70(2.625,4.425) 71(2.275,4.425) 72(1.925,4.425) 73(1.575,4.425) 74(1.225,4.425) 75(0.875,4.425) 76(0.525,4.425) 77(0.175,4.425) 78(-0.175,4.425) 79(-0.525,4.425) 80(-0.875,4.425) 81(-1.225,4.425) 82(-1.575,4.425) 83(-1.925,4.425) 84(-2.275,4.425) 85(-2.625,4.425) 86(-2.975,4.425) 87(-3.325,4.425) 88(-3.675,4.425)
  rect 6x6 smd: 89(0,0)
  TOP keep-out region: -4.95,-3.725 -4.935,-3.802 -4.891,-3.866 -4.827,-3.91 -4.75,-3.925 -4.75,-3.925 -4.1,-3.925 -4.023,-3.91 -3.959,-3.866 -3.915,-3.802 -3.9,-3.725 -3.9,-3.725 -3.9,3.725 -3.915,3.802 -3.959,3.866 -4.023,3.91 -4.1,3.925 -4.1,3.925 -4.75,3.925 -4.827,3.91 -4.891,3.866 -4.935,3.802 -4.95,3.725 -4.95,3.725
  TOP keep-out region: -3.725,4.95 -3.802,4.935 -3.866,4.891 -3.91,4.827 -3.925,4.75 -3.925,4.75 -3.925,4.1 -3.91,4.023 -3.866,3.959 -3.802,3.915 -3.725,3.9 -3.725,3.9 3.725,3.9 3.802,3.915 3.866,3.959 3.91,4.023 3.925,4.1 3.925,4.1 3.925,4.75 3.91,4.827 3.866,4.891 3.802,4.935 3.725,4.95 3.725,4.95
  TOP keep-out region: 3.725,-4.95 3.802,-4.935 3.866,-4.891 3.91,-4.827 3.925,-4.75 3.925,-4.75 3.925,-4.1 3.91,-4.023 3.866,-3.959 3.802,-3.915 3.725,-3.9 3.725,-3.9 -3.725,-3.9 -3.802,-3.915 -3.866,-3.959 -3.91,-4.023 -3.925,-4.1 -3.925,-4.1 -3.925,-4.75 -3.91,-4.827 -3.866,-4.891 -3.802,-4.935 -3.725,-4.95 -3.725,-4.95
  TOP keep-out region: 4.95,3.725 4.935,3.802 4.891,3.866 4.827,3.91 4.75,3.925 4.75,3.925 4.1,3.925 4.023,3.91 3.959,3.866 3.915,3.802 3.9,3.725 3.9,3.725 3.9,-3.725 3.915,-3.802 3.959,-3.866 4.023,-3.91 4.1,-3.925 4.1,-3.925 4.75,-3.925 4.827,-3.91 4.891,-3.866 4.935,-3.802 4.95,-3.725 4.95,-3.725
  silkscreen extent -5.95,-5.95 5.95,5.95, body extent -4.5,-4.5 4.5,4.5, height 3.81
R0402#1 [mm] "R0402"
  rect 0.5x0.5 smd: 1(-0.4,0) 2(0.4,0)
  TOP keep-out region: -0.15,0.35 0.15,0.35 0.15,-0.35 -0.15,-0.35
  silkscreen extent -0.8,-0.4 0.8,0.4, body extent -0.65,-0.25 0.65,0.25, height 3.81
R0402#2 [mm] "R0402"
  rect 0.5x0.5 smd: 1(0.4,0) 2(-0.4,0)
  TOP keep-out region: 0.15,-0.35 -0.15,-0.35 -0.15,0.35 0.15,0.35
  silkscreen extent -0.8,-0.4 0.8,0.4, body extent -0.65,-0.25 0.65,0.25, height 3.81
R0603 [mm] "R0603"
  rect 0.8x0.8 smd: 1(-0.7,0) 2(0.7,0)
  TOP keep-out region: -0.3,0.5 0.3,0.5 0.3,-0.5 -0.3,-0.5
  silkscreen extent -1.25,-0.55 1.25,0.55, body extent -1.1,-0.4 1.1,0.4, height 3.81
SOD323_1D4X1D8 [mm] "SOD323_1D4X1D8"
  rect 1x1.4 smd: N(1.1,0) P(-1.1,0)
  TOP keep-out region: -0.6,0.85 0.6,0.85 0.6,-0.85 -0.6,-0.85
  silkscreen extent -1.4,-0.9 2.1,0.9, body extent -1.35,-0.7 1.35,0.7, height 3.81
SOP8_4D4X5D0_1D27 [mm] "SOP8_4D4X5D0_1D27"
  rect 1.2x0.5 smd: 1(-2.8,1.905) 2(-2.8,0.635) 3(-2.8,-0.635) 4(-2.8,-1.905) 5(2.8,-1.905) 6(2.8,-0.635) 7(2.8,0.635) 8(2.8,1.905)
  TOP keep-out region: -3.55,2.1 -3.535,2.177 -3.491,2.241 -3.427,2.285 -3.35,2.3 -3.35,2.3 -2.25,2.3 -2.173,2.285 -2.109,2.241 -2.065,2.177 -2.05,2.1 -2.05,2.1 -2.05,-2.15 -2.065,-2.227 -2.109,-2.291 -2.173,-2.335 -2.25,-2.35 -2.25,-2.35 -3.35,-2.35 -3.427,-2.335 -3.491,-2.291 -3.535,-2.227 -3.55,-2.15 -3.55,-2.15
  TOP keep-out region: 2.05,2.1 2.065,2.177 2.109,2.241 2.173,2.285 2.25,2.3 2.25,2.3 3.35,2.3 3.427,2.285 3.491,2.241 3.535,2.177 3.55,2.1 3.55,2.1 3.55,-2.15 3.535,-2.227 3.491,-2.291 3.427,-2.335 3.35,-2.35 3.35,-2.35 2.25,-2.35 2.173,-2.335 2.109,-2.291 2.065,-2.227 2.05,-2.15 2.05,-2.15
  silkscreen extent -3.9,-2.5 2,2.7, body extent -2.2,-2.5 2.2,2.5, height 3.81
SOP8_5D28X5D28_1D27 [mm] "SOP8_5D28X5D28_1D27"
  rect 1.5x0.5 smd: 1(-3.7,1.905) 2(-3.7,0.635) 3(-3.7,-0.635) 4(-3.7,-1.905) 5(3.7,-1.905) 6(3.7,-0.635) 7(3.7,0.635) 8(3.7,1.905)
  TOP keep-out region: -4.6,2.1 -4.585,2.177 -4.541,2.241 -4.477,2.285 -4.4,2.3 -4.4,2.3 -3,2.3 -2.923,2.285 -2.859,2.241 -2.815,2.177 -2.8,2.1 -2.8,2.1 -2.8,-2.1 -2.815,-2.177 -2.859,-2.241 -2.923,-2.285 -3,-2.3 -3,-2.3 -4.4,-2.3 -4.477,-2.285 -4.541,-2.241 -4.585,-2.177 -4.6,-2.1 -4.6,-2.1
  TOP keep-out region: 2.8,2.1 2.815,2.177 2.859,2.241 2.923,2.285 3,2.3 3,2.3 4.4,2.3 4.477,2.285 4.541,2.241 4.585,2.177 4.6,2.1 4.6,2.1 4.6,-2.1 4.585,-2.177 4.541,-2.241 4.477,-2.285 4.4,-2.3 4.4,-2.3 3,-2.3 2.923,-2.285 2.859,-2.241 2.815,-2.177 2.8,-2.1 2.8,-2.1
  silkscreen extent -3.7,-2.7 2.7,3.05, body extent -4.05,-2.7 4.05,2.7, height 3.81
SOT23_BEC [mm] "SOT23_BEC"
  rect 0.8x1.2 smd: B(-0.95,-1) C(0,1) E(0.95,-1)
  silkscreen extent -1.5,-0.7 1.5,0.7, body extent -1.5,-1.27 1.5,1.28, height 3.81
SOT235_2D9X1D6_0D95#1 [mm] "SOT235_2D9X1D6_0D95"
  rect 0.6x0.9 smd: 1(-0.95,-1.25) 2(0,-1.25) 3(0.95,-1.25) 4(0.95,1.25) 5(-0.95,1.25)
  TOP keep-out region: -1.4,1.65 -1.385,1.727 -1.341,1.791 -1.277,1.835 -1.2,1.85 -1.2,1.85 1.2,1.85 1.277,1.835 1.341,1.791 1.385,1.727 1.4,1.65 1.4,1.65 1.4,0.85 1.385,0.773 1.341,0.709 1.277,0.665 1.2,0.65 1.2,0.65 -1.2,0.65 -1.277,0.665 -1.341,0.709 -1.385,0.773 -1.4,0.85 -1.4,0.85
  TOP keep-out region: -1.4,-0.85 -1.385,-0.773 -1.341,-0.709 -1.277,-0.665 -1.2,-0.65 -1.2,-0.65 1.2,-0.65 1.277,-0.665 1.341,-0.709 1.385,-0.773 1.4,-0.85 1.4,-0.85 1.4,-1.65 1.385,-1.727 1.341,-1.791 1.277,-1.835 1.2,-1.85 1.2,-1.85 -1.2,-1.85 -1.277,-1.835 -1.341,-1.791 -1.385,-1.727 -1.4,-1.65 -1.4,-1.65
  silkscreen extent -1.7,-1 1.5,0.6, body extent -1.5,-1.5 1.5,1.5, height 3.81
SOT235_2D9X1D6_0D95#2 [mm] "SOT235_2D9X1D6_0D95"
  rect 0.6x0.9 smd: 1(0.95,1.25) 2(0,1.25) 3(-0.95,1.25) 4(-0.95,-1.25) 5(0.95,-1.25)
  TOP keep-out region: 1.4,-1.65 1.385,-1.727 1.341,-1.791 1.277,-1.835 1.2,-1.85 1.2,-1.85 -1.2,-1.85 -1.277,-1.835 -1.341,-1.791 -1.385,-1.727 -1.4,-1.65 -1.4,-1.65 -1.4,-0.85 -1.385,-0.773 -1.341,-0.709 -1.277,-0.665 -1.2,-0.65 -1.2,-0.65 1.2,-0.65 1.277,-0.665 1.341,-0.709 1.385,-0.773 1.4,-0.85 1.4,-0.85
  TOP keep-out region: 1.4,0.85 1.385,0.773 1.341,0.709 1.277,0.665 1.2,0.65 1.2,0.65 -1.2,0.65 -1.277,0.665 -1.341,0.709 -1.385,0.773 -1.4,0.85 -1.4,0.85 -1.4,1.65 -1.385,1.727 -1.341,1.791 -1.277,1.835 -1.2,1.85 -1.2,1.85 1.2,1.85 1.277,1.835 1.341,1.791 1.385,1.727 1.4,1.65 1.4,1.65
  silkscreen extent -1.5,-0.6 1.7,1, body extent -1.5,-1.5 1.5,1.5, height 3.81
SOT236_2D9X1D6_0D95 [mm] "SOT236_2D9X1D6_0D95"
  rect 0.6x0.9 smd: 1(0.95,1.25) 2(0,1.25) 3(-0.95,1.25) 4(-0.95,-1.25) 5(0,-1.25) 6(0.95,-1.25)
  TOP keep-out region: 1.4,-1.7 1.389,-1.757 1.356,-1.806 1.307,-1.839 1.25,-1.85 1.25,-1.85 -1.25,-1.85 -1.307,-1.839 -1.356,-1.806 -1.389,-1.757 -1.4,-1.7 -1.4,-1.7 -1.4,-0.8 -1.389,-0.743 -1.356,-0.694 -1.307,-0.661 -1.25,-0.65 -1.25,-0.65 1.25,-0.65 1.307,-0.661 1.356,-0.694 1.389,-0.743 1.4,-0.8 1.4,-0.8
  TOP keep-out region: 1.4,0.8 1.389,0.743 1.356,0.694 1.307,0.661 1.25,0.65 1.25,0.65 -1.25,0.65 -1.307,0.661 -1.356,0.694 -1.389,0.743 -1.4,0.8 -1.4,0.8 -1.4,1.7 -1.389,1.757 -1.356,1.806 -1.307,1.839 -1.25,1.85 -1.25,1.85 1.25,1.85 1.307,1.839 1.356,1.806 1.389,1.757 1.4,1.7 1.4,1.7
  silkscreen extent -1.5,-0.6 1.7,1, body extent -1.5,-1.5 1.5,1.5, height 3.81
TF16_12D1X5D1_1D27 [mm] "TF16_12D1X5D1_1D27"
  rect 0.7x2 smd: 1(-4.445,-4.2) 2(-3.175,-4.2) 3(-1.905,-4.2) 4(-0.635,-4.2) 5(0.635,-4.2) 6(1.905,-4.2) 7(3.175,-4.2) 8(4.445,-4.2) 9(4.445,4.2) 10(3.175,4.2) 11(1.905,4.2) 12(0.635,4.2) 13(-0.635,4.2) 14(-1.905,4.2) 15(-3.175,4.2) 16(-4.445,4.2)
  TOP keep-out region: -4.945,5.15 -4.93,5.227 -4.886,5.291 -4.822,5.335 -4.745,5.35 -4.745,5.35 4.745,5.35 4.822,5.335 4.886,5.291 4.93,5.227 4.945,5.15 4.945,5.15 4.945,3.25 4.93,3.173 4.886,3.109 4.822,3.065 4.745,3.05 4.745,3.05 -4.745,3.05 -4.822,3.065 -4.886,3.109 -4.93,3.173 -4.945,3.25 -4.945,3.25
  TOP keep-out region: -4.945,-3.25 -4.93,-3.173 -4.886,-3.109 -4.822,-3.065 -4.745,-3.05 -4.745,-3.05 4.745,-3.05 4.822,-3.065 4.886,-3.109 4.93,-3.173 4.945,-3.25 4.945,-3.25 4.945,-5.15 4.93,-5.227 4.886,-5.291 4.822,-5.335 4.745,-5.35 4.745,-5.35 -4.745,-5.35 -4.822,-5.335 -4.886,-5.291 -4.93,-5.227 -4.945,-5.15 -4.945,-5.15
  silkscreen extent -6.05,-4 6.05,2.9, body extent -6.05,-2.55 6.05,2.55, height 3.81
WF2_3D5X7D0_1D25_SMD_L [mm] "WF2_3D5X7D0_1D25_SMD_L"
  rect 0.8x1.2 smd: 1(-0.625,-2.25) 2(0.625,-2.25)
  rect 1.7x3 smd: 3(3.175,0.25) 4(-3.175,0.25)
  TOP keep-out region: 1.15,-2.8 1.135,-2.877 1.091,-2.941 1.027,-2.985 0.95,-3 0.95,-3 -0.95,-3 -1.027,-2.985 -1.091,-2.941 -1.135,-2.877 -1.15,-2.8 -1.15,-2.8 -1.15,-1.7 -1.135,-1.623 -1.091,-1.559 -1.027,-1.515 -0.95,-1.5 -0.95,-1.5 0.95,-1.5 1.027,-1.515 1.091,-1.559 1.135,-1.623 1.15,-1.7 1.15,-1.7
  silkscreen extent -3.6,-2.55 3.6,1.95, body extent -3.5,-1.75 3.5,1.75, height 3.81
WF2_4D4X7D25_1D25_SMD_L#1 [mm] "WF2_4D4X7D25_1D25_SMD_L"
  rect 0.8x1.8 smd: 1(0.625,2.6) 2(-0.625,2.6)
  rect 1.8x2.9 smd: 3(-3.175,0.05) 4(3.175,0.05)
  TOP keep-out region: -1.15,3.45 -1.135,3.527 -1.091,3.591 -1.027,3.635 -0.95,3.65 -0.95,3.65 0.95,3.65 1.027,3.635 1.091,3.591 1.135,3.527 1.15,3.45 1.15,3.45 1.15,1.75 1.135,1.673 1.091,1.609 1.027,1.565 0.95,1.55 0.95,1.55 -0.95,1.55 -1.027,1.565 -1.091,1.609 -1.135,1.673 -1.15,1.75 -1.15,1.75
  silkscreen extent -3.62,-2.2 3.62,3.75, body extent -3.62,-2.2 3.62,2.2, height 3.81
WF2_4D4X7D25_1D25_SMD_L#2 [mm] "WF2_4D4X7D25_1D25_SMD_L"
  rect 0.8x1.8 smd: 1(-0.625,-2.6) 2(0.625,-2.6)
  rect 1.8x2.9 smd: 3(3.175,-0.05) 4(-3.175,-0.05)
  TOP keep-out region: 1.15,-3.45 1.135,-3.527 1.091,-3.591 1.027,-3.635 0.95,-3.65 0.95,-3.65 -0.95,-3.65 -1.027,-3.635 -1.091,-3.591 -1.135,-3.527 -1.15,-3.45 -1.15,-3.45 -1.15,-1.75 -1.135,-1.673 -1.091,-1.609 -1.027,-1.565 -0.95,-1.55 -0.95,-1.55 0.95,-1.55 1.027,-1.565 1.091,-1.609 1.135,-1.673 1.15,-1.75 1.15,-1.75
  silkscreen extent -3.63,-3.75 3.62,2.2, body extent -3.63,-2.2 3.62,2.2, height 3.81
WF4_3D5X9D5_1D25_SMD_L [mm] "WF4_3D5X9D5_1D25_SMD_L"
  rect 0.8x1.2 smd: 1(1.875,2.25) 2(0.625,2.25) 3(-0.625,2.25) 4(-1.875,2.25)
  rect 1.7x3 smd: 5(-4.425,-0.25) 6(4.425,-0.25)
  TOP keep-out region: -2.4,2.8 -2.385,2.877 -2.341,2.941 -2.277,2.985 -2.2,3 -2.2,3 2.2,3 2.277,2.985 2.341,2.941 2.385,2.877 2.4,2.8 2.4,2.8 2.4,1.7 2.385,1.623 2.341,1.559 2.277,1.515 2.2,1.5 2.2,1.5 -2.2,1.5 -2.277,1.515 -2.341,1.559 -2.385,1.623 -2.4,1.7 -2.4,1.7
  silkscreen extent -4.75,-1.95 4.75,2.45, body extent -4.75,-1.75 4.75,1.75, height 3.81
WF8_3D5X14D5_1D25_SMD_L [mm] "WF8_3D5X14D5_1D25_SMD_L"
  rect 0.8x1.2 smd: 1(4.375,2.25) 2(3.125,2.25) 3(1.875,2.25) 4(0.625,2.25) 5(-0.625,2.25) 6(-1.875,2.25) 7(-3.125,2.25) 8(-4.375,2.25)
  rect 1.7x3 smd: 9(-6.925,-0.25) 10(6.925,-0.25)
  TOP keep-out region: -4.9,2.8 -4.885,2.877 -4.841,2.941 -4.777,2.985 -4.7,3 -4.7,3 4.7,3 4.777,2.985 4.841,2.941 4.885,2.877 4.9,2.8 4.9,2.8 4.9,1.7 4.885,1.623 4.841,1.559 4.777,1.515 4.7,1.5 4.7,1.5 -4.7,1.5 -4.777,1.515 -4.841,1.559 -4.885,1.623 -4.9,1.7 -4.9,1.7
  silkscreen extent -7.25,-1.95 7.25,2.7, body extent -7.25,-1.75 7.25,1.75, height 3.81
XTAL_3D2X2D5 [mm] "XTAL_3D2X2D5"
  rect 1.4x1.2 smd: 1(-1.1,-0.8) 2(1.1,-0.8) 3(1.1,0.8) 4(-1.1,0.8)
  TOP keep-out region: -1.95,-0.25 -1.935,-0.173 -1.891,-0.109 -1.827,-0.065 -1.75,-0.05 -1.75,-0.05 -0.45,-0.05 -0.373,-0.065 -0.309,-0.109 -0.265,-0.173 -0.25,-0.25 -0.25,-0.25 -0.25,-1.35 -0.265,-1.427 -0.309,-1.491 -0.373,-1.535 -0.45,-1.55 -0.45,-1.55 -1.75,-1.55 -1.827,-1.535 -1.891,-1.491 -1.935,-1.427 -1.95,-1.35 -1.95,-1.35
  TOP keep-out region: 0.25,1.35 0.265,1.427 0.309,1.491 0.373,1.535 0.45,1.55 0.45,1.55 1.75,1.55 1.827,1.535 1.891,1.491 1.935,1.427 1.95,1.35 1.95,1.35 1.95,0.25 1.935,0.173 1.891,0.109 1.827,0.065 1.75,0.05 1.75,0.05 0.45,0.05 0.373,0.065 0.309,0.109 0.265,0.173 0.25,0.25 0.25,0.25
  silkscreen extent -2.1,-1.7 1.95,1.55, body extent -1.6,-1.25 1.6,1.25, height 3.81

## Via types
v1: diameter 0.5, hole 0.25, TOP to BOTTOM, 439 vias
v2: diameter 0.4, hole 0.2, TOP to BOTTOM, 22 vias

## Nets (pads, with @x,y where several pads share a name; then routed paths per layer and width w, separated by ;. In a path a pad name is that pad's centre, name@x,y a point inside that pad or via, vN(x,y) a via of type N, cw(c..) or ccw(c..) an arc to the next point about the centre after c; other vN are vias at no path point)
5V_USB_OUT: C75.1 C76.1 J4.4 R33.1 R55.2 | length 36.5
  TOP w0.5: J4.4@13.85,33.625 J4.4@13.675,33.8 13.675,34.675 v1(13.55,34.8) v1(13.55,35.45) v1(14.2,35.45) ; R55.2@27.7,12.9 v1(27.7,15.05)
  POWER w0.5: v1(14.2,35.45) 23.9,35.45 26.6,32.85 26.6,16.15 v1(27.7,15.05)
  other v1: 14.2,34.8
12V_IN: C49.1 C50.1 C79.1 J6.8 R35.2 U5.5 | length 1.3
  BOTTOM w0.5: U5.5@24.45,35.2 25.6,35.2 R35.2@25.65,35.35
  other v1: 29.25,34.8 29.95,34.8 29.25,35.45 29.95,35.45
AADC_AIN_MIC2: C2.1 R29.2 | length 21.1
  TOP w0.125: R29.2@5,30.7 5,28.05 6.25,26.8 6.25,18.4 7.95,16.7 11.1,16.7 11.8,16 12.7,16 C2.1@13.3,15.4
ADAC_AOUT_R: C3.2 R25.2 | length 15.4
  TOP w0.125: v1(1.25,18.4) 1.25,18.9 1.675,19.325 3.925,19.325 7.55,15.7 10.7,15.7 C3.2@12.8,13.6
  BOTTOM w0.125: v1(1.25,18.4) 1.25,18.8 R25.2@1.55,19.1
AVDD: C85.1 C86.1 C89.1 C90.1 C91.2 C92.2 C93.2 R26.2 R60.1 U11.5 U13.A1 U13.A7 U13.C7 | length 29.7
  TOP w0.4: v2(16.25,20.55) 16.25,21.15 ; C90.1@20.4,21.5 v2(21.35,21.5)
  TOP w0.5: R26.2@5.1,32.65 5.8,33.35 8.65,33.35 11.1,30.9 13.5,30.9 14,30.4 v1(14,29.3) ; U11.5@17.35,26.85 C86.1@17.4,25.75 R60.1@16.25,25.75 16.25,24.6 C85.1@16.4,24.6 16.4,24.35 15.075,23.025 15.075,21.45 15.361,21.164 15.85,21.164 C92.2@15.85,21.2 C91.2@16.85,21.2 C93.2@17.85,21.2
  BOTTOM w0.3: v2(16,19.7) 16.489,19.7 U13.C7@16.81,19.379 ; v2(16.25,20.55) 16.679,20.55 U13.A7@16.81,20.679 ; U13.A1@21.19,20.679 21.19,21.34 v2(21.35,21.5)
  BOTTOM w0.5: v1(14,29.3) 14.925,28.375 14.925,28.125 v1(16.65,26.4)
CAM_I2C2_SCL: R65.1 U1.86 U13.A3 | length 26.3
  TOP w0.125: U1.86@15.325,12.625 v1(15.325,14.3)
  POWER w0.125: v1(15.325,14.3) 14.925,14.7 13.675,14.7 12.75,15.625 12.75,22.2 16.25,25.7 20.05,25.7 v1(20.3,25.45)
  BOTTOM w0.125: U13.A3@19.73,20.679 19.73,21.28 R65.1@21.25,22.8 20.75,23.3 20.75,25 v1(20.3,25.45)
CAM_I2C2_SDA: R66.1 U1.85 U13.B3 | length 28.8
  TOP w0.125: v1(15.3,14.95) 15.775,14.475 15.775,13.975 15.675,13.875 U1.85@15.675,12.625
  POWER w0.125: v1(15.3,14.95) 13.8,14.95 13,15.75 13,22.05 16.35,25.4 19.65,25.4 20.05,25 v1(21.35,25)
  BOTTOM w0.125: U13.B3@19.73,20.029 20.1,20.399 20.1,21.2 21.25,22.35 21.85,22.35 22.25,22.75 R66.1@22.25,22.8 22.75,23.3 22.75,24.05 21.8,25 v1(21.35,25)
CAM_MCLK0: R67.2 U1.88 | length 2
  TOP w0.125: U1.88@14.625,12.625 R67.2@14.625,14.6
CAM_RST0: C107.1 R68.1 U1.84 U13.C4 | length 24.9
  TOP w0.125: v1(15.3,15.625) 16.025,14.9 U1.84@16.025,12.625
  POWER w0.125: v1(15.3,15.625) 14.875,15.2 13.925,15.2 13.25,15.875 13.25,21.9 16.45,25.1 18.45,25.1 v1(18.65,24.9)
  BOTTOM w0.125: v1(18.65,24.9) 18.7,24.85 18.7,23.9 R68.1@18.4,23.6 C107.1@18.4,22.6 18,22.2 18,21.5 18.65,20.85 18.65,19.729 U13.C4@19,19.379
CAM_RX0_0N: U1.80 U13.F5 | length 6.3
  TOP w0.125: v1(17.05,13.7) 17.05,13.448 17.425,13.073 U1.80@17.425,12.625
  BOTTOM w0.125: v1(17.05,13.7) 17.05,13.475 ccw(c17.175,13.475) 17.175,13.35 17.35,13.35 ccw(c17.35,13.475) 17.475,13.475 17.475,16.414 18.175,17.114 18.175,17.334 U13.F5@18.27,17.429
CAM_RX0_0P: U1.81 U13.E5 | length 6.3
  TOP w0.125: v1(17.05,14.4) 16.625,13.975 16.625,13.519 17.075,13.069 U1.81@17.075,12.625
  BOTTOM w0.125: v1(17.05,14.4) 17.225,14.575 17.225,16.518 17.925,17.218 17.925,17.571 18.27,17.916 U13.E5@18.27,18.079
CAM_RX0_1N: U1.74 U13.E3 | length 6.2
  TOP w0.125: U1.74@19.525,12.625 19.525,13.16 20.025,13.66 20.025,14.225 v1(19.6,14.65)
  BOTTOM w0.125: v1(19.6,14.65) 19.775,14.825 19.775,16.867 19.4,17.242 19.4,17.588 19.73,17.918 U13.E3@19.73,18.079
CAM_RX0_1P: U1.75 U13.F3 | length 6.2
  TOP w0.125: U1.75@19.175,12.625 19.175,13.164 19.6,13.589 v1(19.6,13.95)
  BOTTOM w0.125: v1(19.6,13.95) 19.6,13.675 ccw(c19.725,13.675) 19.725,13.55 19.864,13.55 ccw(c19.864,13.711) 20.025,13.711 20.025,16.97 19.73,17.265 U13.F3@19.73,17.429
CAM_RX0_3N: U1.78 U13.D5 | length 7.7
  TOP w0.125: U1.78@18.125,12.625 18.125,13.124 17.825,13.424 17.825,14.795 17.475,15.145 17.475,16.414 18.575,17.514 18.575,19 v2(18.625,19.05)
  BOTTOM w0.125: U13.D5@18.27,18.729 18.303,18.729 18.606,19.033 v2(18.625,19.05)
CAM_RX0_3P: U1.79 U13.C5 | length 7.8
  TOP w0.125: U1.79@17.775,12.625 17.775,13.121 17.575,13.321 17.575,14.691 17.225,15.041 17.225,16.518 18.325,17.618 18.325,18.625 v2(17.9,19.05)
  BOTTOM w0.125: v2(17.9,19.05) 17.941,19.05 U13.C5@18.27,19.379
CAM_RX0_4N: U1.72 U13.F2 | length 7.2
  TOP w0.125: U1.72@20.225,12.625 20.25,12.625 20.25,13.134 20.75,13.634 20.75,14.075 v1(20.925,14.25)
  BOTTOM w0.125: U13.F2@20.46,17.429 20.46,17.287 21.35,16.397 21.35,13.712 cw(c21.138,13.712) 21.138,13.5 cw(c21.138,13.713) 20.925,13.713 v1(20.925,14.25)
CAM_RX0_4P: U1.73 U13.D3 | length 7.2
  TOP w0.125: U1.73@19.875,12.625 19.875,13.112 20.5,13.737 20.5,14.525 v1(20.925,14.95)
  BOTTOM w0.125: U13.D3@19.73,18.729 20.1,18.359 20.1,17.293 21.1,16.293 21.1,15.125 v1(20.925,14.95)
CAM_RX0_CLKN: U1.76 U13.E4 | length 6.1
  TOP w0.125: v1(18.575,13.65) 18.575,13.382 18.825,13.132 U1.76@18.825,12.625
  BOTTOM w0.125: v1(18.575,13.65) 18.15,14.075 18.15,14.57 18.375,14.795 18.375,16.784 18.675,17.084 18.675,17.614 19,17.939 U13.E4@19,18.079
CAM_RX0_CLKP: U1.77 U13.F4 | length 6
  TOP w0.125: U1.77@18.475,12.625 18.475,13.128 18.15,13.453 18.15,14.479 cw(c18.321,14.479) 18.321,14.65 18.404,14.65 cw(c18.404,14.479) 18.575,14.479 v1(18.575,14.35)
  BOTTOM w0.125: v1(18.575,14.35) 18.625,14.4 18.625,16.68 18.925,16.98 18.925,17.354 U13.F4@19,17.429
CDS+: Q1.C R50.1 R51.2 R52.2 U1.59 | length 10.8
  TOP w0.125: U1.59@22.725,9.425 25.825,9.425 26.2,9.8 27.1,9.8 R52.2@27.7,10.4 R50.1@29.8,10.4 Q1.C@29.8,11.6 R51.2@31.9,11.6
CHASSI_GND: C1.2 C4.2 C7.2 C8.2 C9.2 C10.2 C11.2 C12.2 C13.2 C14.2 C15.2 C16.2 C17.2 C18.2 C19.2 C20.2 C21.2 C22.2 C23.2 C24.2 C25.2 C26.2 C27.2 C28.2 C29.2 C30.2 C31.2 C32.2 C35.2 C36.2 C37.1 C39.1 C40.1 C41.1 C43.2 C44.2 C47.2 C48.2 C49.2 C50.2 C51.2 C53.2 C55.2 C56.2 C58.2 C59.2 C60.2 C61.2 C62.2 C63.2 C65.2 C66.2 C67.2 C68.2 C69.2 C70.2 C71.2 C72.2 C73.2 C74.2 C75.2 C76.2 C77.1 C78.1 C79.2 C80.1 C81.2 C82.2 C83.2 C84.2 C85.2 C86.2 C87.2 C88.2 C89.2 C90.2 C91.1 C92.1 C93.1 C94.2 C95.2 C96.1 C97.1 C98.2 C100.1 C101.1 C102.1 C103.1 C104.1 C105.1 C106.2 C107.2 DA4.P EPAD_HOLE1.1 H1.1 H2.1 H3.1 H4.1 J1.1 J1.3 J1.13 J1.19 J1.20 J2.3 J2.4 J3.2 J3.3 J3.4 J4.1 J4.5 J4.6 J5.3 J5.5 J5.6 J6.7 J6.9 J6.10 J7.3 J7.4 J8.3 Q1.E R1.2 R14.2 R15.2 R20.1 R28.1 R36.2 R38.2 R43.2 R46.1 R52.1 R54.1 R56.1 R61.1 R64.1 R70.1 U1.42 U1.89 U2.7 U4.4 U5.2 U6.2 U7.2 U8.2 U9.2 U11.2 U12.2 U13.B1 U13.B7 U13.C3 U13.D2 U13.E6 U13.F6 U14.1 U14.2 U15.3 U15.7 Y1.2 Y1.4 | length 108.1
  TOP w0.1: v2(17.175,20.35) 17.575,20.75 20.425,20.75 v2(20.825,20.35) ; v2(17.9,18.4) 17.5,18.8 17.5,19.25 18.025,19.775 19.35,19.775 v2(19.35,19.725)
  TOP w0.125: v1(5.95,3.95) 5.95,3.25 6.975,2.225 9.8,2.225 v1(10,2.4) ; v1(9.15,6.75) 9.15,6.25 11.25,6.25 13.35,4.15 v1(13.35,4.05)
  TOP w0.15: v1(8.95,26.95) 10.525,26.95 10.7,27.125 10.7,28.45 10.55,28.6 U6.2@9.95,28.6
  TOP w0.2: v1(21.05,4.55) 21.275,4.325 U1.42@21.275,3.775 21.275,3.325 21.6,3 v1(21.6,2.8)
  TOP w0.3: J1.1@1.55,16.3 v1(5.1,16.3) ; v1(2.55,15.3) v1(5.1,15.3) ; R14.2@10.6,14.8 11,14.8 11.6,14.2 v1(11.6,14.1)
  TOP w0.4: v1(0.5,10.3) J1.13@1.55,10.3 ; v1(0.5,15.3) J1.3@1.55,15.3 v1(2.55,15.3) ; v1(0.5,16.3) J1.1@1.55,16.3 ; v1(23.7,12.5) 24.3,13.1 C20.2@24.3,13.3
  TOP w0.5: v1(5.75,28.2) 6.2,28.65 7.95,28.65 v1(8.45,28.15) ; v1(9.1,28.6) U6.2@9.95,28.6 ; v1(9.9,5.75) 11.155,5.75 11.605,5.3 U4.4@11.605,4.6 ; v1(10.25,32.8) 9.925,33.125 J4.1@9.925,33.8 9.925,34.225 v1(10.65,34.95) ; v1(11.325,22.325) 11.325,22.3 11.75,21.875 C83.2@11.75,19.55 ; v1(11.95,25.3) C88.2@11.95,24.65 11.85,24.55 U12.2@11.85,23.6 11.85,23.025 v1(12.35,22.525) ; R15.2@12,3.2 12,3.5 11.605,3.895 U4.4@11.605,4.6 ; v1(12.3,4.6) U4.4@11.605,4.6 ; v1(16.4,28.5) U11.2@16.4,29.35 ; C18.2@23.1,2.8 23.1,2.5 v1(23.5,2.1) ; C17.2@25.1,5.45 27.25,5.45 v1(27.25,5.4) ; R52.1@27.7,9.6 v1(28.4,9.6) ; v1(27.975,32.8) 28.525,33.35 J6.7@28.525,33.8 28.5,33.8 v1(28.5,34.8) ; v1(32.8,9.175) J5.3@33.8,9.175
  POWER w0.4: 25.7,13.313 30.788,13.313 31.4,12.7 33.55,12.7 v1(33.55,12.45)
  POWER w0.5: v1(16.55,4.6) 16.55,3.95 19.325,3.95 19.325,4.7 v1(19.175,4.85) ; v1(24.6,14) v1@25.7,12.9 ; v1(25.7,12.8) v1@25.7,12.9 ; 25.7,13.313 v1@25.7,12.9
  BOTTOM w0.125: v1(14,16.85) C103.1@14,17.5 ; v1@34,5.85 v1(34,5.9)
  BOTTOM w0.15: v1(15.25,20.25) 15.948,20.25 16.104,20.1 16.739,20.1 U13.B7@16.81,20.029
  BOTTOM w0.3: U13.B7@16.81,20.029 16.854,20.029 v2(17.175,20.35) ; v2(17.15,17.05) 17.161,17.05 U13.F6@17.54,17.429 17.219,17.75 v2@17.211,17.75 ; v2(17.175,17.75) v2@17.211,17.75 ; v2(17.9,18.4) 17.579,18.079 U13.E6@17.54,18.079 v2@17.211,17.75 ; v2(19.35,19.725) 19.384,19.725 U13.C3@19.73,19.379 19.771,19.379 v2(20.1,19.05) 20.139,19.05 U13.D2@20.46,18.729 ; v2(20.825,20.35) 20.869,20.35 U13.B1@21.19,20.029 21.6,20.029 22.1,20.529 v1(22.1,20.8)
  BOTTOM w0.4: v1(3.85,22.2) 4.125,22.475 U2.7@4.125,23.25 4.125,24.175 C35.2@4.7,24.75
  BOTTOM w0.5: v1(3.45,28.9) 3.575,29.025 J3.2@4.8,29.025 5.5,29.025 5.75,28.775 v1(5.75,28.2) ; 9.7,5.2 v1(9.7,6.4) ; R36.2@20.8,35.35 20.85,35.2 U5.2@21.95,35.2 22.8,35.2 v1(22.8,34.8) ; v1(28.7,2.95) v1(28.7,3.65) v1@28.9,3.65 ; U15.3@30.8,14.435 31.5,14.435 31.665,14.6 v1(32.6,14.6) ; v1(35.35,12.95) 35.55,13.165 U15.7@36.4,13.165 37.25,13.165 v1(37.5,12.95)
  BOTTOM w0.6: 9.7,5.2 U8.2@10.9,5.2 12.3,5.2 v1(12.3,4.6) ; C59.2@26.35,4.9 26.9,5.45 28.65,5.45 28.9,5.2 U7.2@28.9,4.55 v1@28.9,3.65 ; U9.2@34,5.05 v1@34,5.85
  other v1: 4.15,0.5 6.7,0.5 9.25,0.5 11.3,0.5 13.6,0.5 15.75,0.5 21.1,0.5 25.25,0.5 27.25,0.5 30.3,0.5 34.2,0.5 20,1 32.15,1.1 5.1,1.3 17.45,1.65 18.8,1.7 9.3,2.4 26.4,2.7 6.5,2.95 29.9,2.95 29.3,3.3 26.4,3.35 29.9,3.65 9.7,3.7 32.2,3.7 12.6,3.9 23.15,3.9 37.5,3.95 22.5,4 24.55,4.1 27.1,4.1 0.5,4.2 2,4.3 32.2,4.4 15.25,4.6 15.9,4.6 30.85,4.75 28.8,5.4 9.25,5.75 32.55,5.85 16.2,5.95 33.25,6 0.5,6.2 19.1,6.2 19.8,6.2 35.5,6.6 17.1,6.7 17.9,6.7 18.6,6.7 37.5,6.7 7.35,6.75 19.8,6.85 6,7.2 9.85,7.3 31.4,7.45 2.8,7.55 32.3,7.65 25.7,8 36,8 21.95,8.1 0.5,8.2 31.75,8.2 23.9,8.6 29,8.6 37.1,8.6 19.8,8.8 16.9,8.9 24.85,8.95 5.75,9.05 18.9,9.1 14.7,9.45 29.4,9.6 30.5,9.6 5,9.8 19.8,9.8 25.6,9.9 19.2,10.2 24.05,10.25 16.3,10.4 21.9,10.5 12.8,10.6 31.9,10.8 15.8,10.95 19.5,11 16.6,11.1 27.7,11.1 30.7,11.1 21.9,11.2 37.4,11.2 24.4,11.5 26.5,11.8 14.65,11.85 17.6,11.85 19.75,11.85 29.8,13 11.8,13.2 22.225,13.375 0.5,13.9 27.055,14.423 12.6,14.5 28.4,14.6 21.85,14.75 16.5,14.8 29.3,14.8 34.35,15 19.1,15.1 8.45,15.2 9.15,15.2 6.4,15.3 16.1,15.7 25.9,15.7 21.9,15.75 23.5,15.75 28.25,15.75 29.35,15.75 33.225,15.75 9,16.2 10.9,16.2 34.95,16.2 37.5,16.3 16.675,16.4 15.4,16.55 2.9,16.6 19.25,16.65 11.8,16.7 27.25,16.85 21.75,16.9 7,17 30.85,17 33.2,17 24.6,17.1 25.9,17.1 34,17.15 1.3,17.3 12.2,17.55 11.4,18.4 33.5,18.8 23.55,18.9 36.3,18.95 0.525,19.45 4.1,20.25 31.3,20.3 14.1,20.45 27.3,20.8 7,20.9 30.45,21.2 4.1,21.3 32.6,21.35 23.45,21.4 36.95,21.45 25.8,21.8 21.85,21.9 8.875,21.95 18.5,21.95 10.6,22 14.3,22.15 0.5,22.2 37.5,22.65 15.85,22.7 23.45,23.2 16.75,23.7 9.8,24.25 25.8,24.25 29.3,24.3 19.4,24.9 0.55,25.1 9.2,25.3 37.5,25.4 22.2,25.45 23.45,25.45 28,25.45 35.625,25.525 4.8,25.7 14.5,25.85 31.205,26.166 19.075,26.175 33.35,26.225 18.2,26.45 5.7,26.7 19.85,26.8 28.421,26.785 29.526,26.785 22.15,27.1 16.5,27.5 17.8,27.7 35.493,28.111 25.8,28.2 14,28.3 23.65,28.3 27.725,28.3 15.6,28.5 17.8,28.5 20.65,28.55 0.575,28.65 37.482,28.642 30.15,29 22.15,29.35 33,29.45 24.15,29.5 27.75,29.5 34.975,29.5 8.95,30.05 10.2,30.4 25.85,30.45 20.4,30.8 18.4,30.9 0.5,31.15 14.1,31.3 16.3,31.3 9.1,31.7 11.3,31.7 6.2,32.3 15.4,32.5 14,32.6 12.9,32.8 21,32.8 24.95,32.8 35.8,32.95 4.1,33.35 31.073,33.548 19.1,33.6 37.482,33.946 15.4,34 0.55,34.2 3.5,34.25 19.1,34.3 32.35,34.35 34.275,34.4 20.325,34.6 12.85,34.8 23.5,34.8 9,34.95 30.45,35.95 9.6,36 12.25,36.2 23.117,36.465 10.9,36.5 31.05,37.1 3.85,37.5 8.75,37.5 12.05,37.5 14.9,37.5 19.75,37.5 21.85,37.5 24.3,37.5 25.95,37.5 29.05,37.5 30.05,37.5 34.2,37.5
  other v2: 17.95,15.35 20.45,15.375 17.925,16.25 20.45,16.4
DVDD: C83.1 C84.1 C94.1 C95.1 C96.2 C97.2 U12.5 U13.B5 U13.C1 U13.D6 | length 14.6
  TOP w0.4: 17.075,19.425 17.9,20.25 v2(17.9,20.35) 17.95,20.3 20.05,20.3 20.65,19.7 v2(20.825,19.7) C97.2@21.45,19.7 ; v2@17.1,18.475 v2(17.175,18.4)
  TOP w0.5: U12.5@12.8,21.1 13.15,20.75 13.15,20.5 C83.1@13.15,19.55 13,19.4 C84.1@13,18.4 13.35,18.05 C94.1@14.45,18.05 ; C94.1@14.45,18.2 C94.1@14.45,18.05 ; C96.2@17.05,19.05 17.05,19.4 17.075,19.425 ; v2(17.175,18.4) 16.9,18.4 16.55,18.05 C95.1@15.6,18.05 C94.1@14.45,18.05
  BOTTOM w0.3: v2(17.175,18.4) 17.504,18.729 U13.D6@17.54,18.729 ; v2(17.9,20.35) 17.949,20.35 U13.B5@18.27,20.029 ; v2(20.825,19.7) 20.869,19.7 U13.C1@21.19,19.379
EPHY_LNK: R59.2 U1.55 | length 7.7
  TOP w0.125: U1.55@22.725,8.025 23.45,8.025 23.85,7.625 24.875,7.625 25.25,7.25 29.35,7.25 R59.2@29.9,7.8
EPHY_RXN: R13.1 U1.62 | length 17.6
  TOP w0.125: U1.62@22.725,10.475 23.05,10.475 23.1,10.525 23.631,10.525 23.856,10.75 24.717,10.75 26.55,12.583 26.55,15.058 27.742,16.25 34.239,16.25 35.15,17.161 35.15,17.75 R13.1@35.4,18
EPHY_RXP: R12.1 U1.63 | length 17.5
  TOP w0.125: U1.63@22.725,10.825 23.05,10.825 23.1,10.775 23.527,10.775 23.752,11 24.614,11 26.3,12.686 26.3,15.162 27.638,16.5 34.136,16.5 34.9,17.264 34.9,17.812 ccw(c34.713,17.812) 34.713,18 R12.1@34.4,18
EPHY_SPD: R58.1 U1.56 | length 5.9
  TOP w0.125: U1.56@22.725,8.375 23.475,8.375 23.975,7.875 25,7.875 25.375,7.5 27.8,7.5 R58.1@28.1,7.8
EPHY_TXN: R5.1 U1.64 | length 8.2
  TOP w0.125: U1.64@22.725,11.175 23.05,11.175 23.1,11.225 23.424,11.225 25.4,13.201 25.4,17.5 R5.1@25.7,17.8
EPHY_TXP: R3.1 U1.65 | length 8.1
  TOP w0.125: U1.65@22.725,11.525 23.05,11.525 23.1,11.475 23.321,11.475 25.15,13.304 25.15,17.612 ccw(c24.963,17.612) 24.963,17.8 R3.1@24.7,17.8
GND_SIGNAL: C5.1 C6.1 R1.1 U1.1 | length 6.6
  TOP w0.125: U1.1@13.875,11.875 14,11.875 14,12.025
  TOP w0.5: R1.1@13.3,16.5 14,15.8 v1(14,13.3) v1(14,12.6) 14,12.025
  BOTTOM w0.5: C5.1@13.3,12.6 v1(14,12.6) ; C6.1@13.3,13.6 13.7,13.6 v1(14,13.3)
I2C_ID_SEL: R69.1 R70.2 U13.A5 | length 4.5
  BOTTOM w0.125: R69.1@16.9,24.6 17.225,24.275 17.225,22.725 R70.2@17.35,22.6 17.35,21.599 U13.A5@18.27,20.679
INCK: R67.1 U13.C2 | length 15.7
  TOP w0.125: R67.1@14.625,15.4 v1(14.625,16.4)
  POWER w0.125: v1(14.625,16.4) 14.625,20.425 15.45,21.25 20.5,21.25 21.75,20 v2(21.75,18.8)
  BOTTOM w0.125: U13.C2@20.46,19.379 20.485,19.379 20.814,19.05 21.5,19.05 v2(21.75,18.8)
IOIN: J1.16 U1.28 | length 19.9
  TOP w0.125: J1.16@3.85,8.8 4.3,8.8 5,8.1 5,3 6.525,1.475 14.725,1.475 16.375,3.125 U1.28@16.375,3.775
IOOUT: J1.17 U1.29 | length 22.6
  TOP w0.125: J1.17@1.55,8.3 4.4,8.3 4.75,7.95 4.75,2.85 6.375,1.225 14.875,1.225 16.725,3.075 U1.29@16.725,3.775
IOVDD: C7.1 C8.1 C9.1 C10.1 C11.1 C19.1 C72.1 C73.1 C98.1 C100.2 C101.2 R50.2 R63.2 R65.2 R66.2 R68.2 R69.2 U1.5 U1.36 U1.39 U1.68 U1.82 U9.5 U13.D4 U13.E2 | length 25.6
  TOP w0.125: v2@20.8,18.4 v2(20.825,18.4)
  TOP w0.2: U1.5@13.875,10.475 14.575,10.475 v1(14.7,10.35) ; U1.82@16.725,12.625 16.725,11.85 v1(16.75,11.85) ; U1.36@19.175,3.775 19.175,4.225 19.35,4.4 19.85,4.4 v1(20,4.55) 20.225,4.325 U1.39@20.225,3.775 ; v1(21.5,11.85) 21.625,11.975 U1.68@21.625,12.625
  TOP w0.5: C98.1@17.7,23 v1(17.7,23.7) 17.75,23.75 18.7,23.75 v1(19.2,24.25) v1(19.9,24.25) v1(21.25,24.25) v1(21.9,24.25) ; v2(19.375,18.4) C100.2@20.1,18.4 v2@20.8,18.4 ; v2(20.825,18.4) 21.1,18.125 C101.2@21.1,17.7 v1(21.85,17.7) ; R50.2@30.6,10.4 v1(31.3,10.4)
  BOTTOM w0.125: R63.2@20.2,23.6 R63.2@20.25,23.6 ; v1@21.8,17.75 v1(21.85,17.7)
  BOTTOM w0.3: U13.D4@19,18.729 19.046,18.729 v2(19.375,18.4) ; U13.E2@20.46,18.079 20.504,18.079 v2(20.825,18.4)
  BOTTOM w0.5: v1(14.7,10.35) 14.75,10.35 C9.1@15.4,9.7 ; v1(16.75,11.85) C10.1@16.75,12.55 ; v1(17.7,23.7) R69.2@17.7,24.6 ; v1(19.2,24.25) R68.2@19.2,23.6 R63.2@20.2,23.6 ; v1(20,4.55) C19.1@20,3.9 20,3.45 20.1,3.35 C7.1@20.1,2.9 ; v1(21.25,24.25) R65.2@21.25,23.6 R66.2@22.25,23.6 22.25,23.9 v1(21.9,24.25) ; v1(21.5,11.85) C11.1@21.5,12.55 ; v1(21.85,17.7) 22.3,17.25 C8.1@23.5,17.25
  other v1: 35.9,9.3 36.55,9.3 35.9,9.95 36.55,9.95
IRCUT_ENA: U1.52 U15.8 | length 19
  TOP w0.125: U1.52@22.725,6.975 23.35,6.975 23.45,6.875 24.5,6.875 24.875,6.5 32.125,6.5 32.325,6.7 34.55,6.7 35.15,7.3 35.15,11.2 v1(34.85,11.5)
  BOTTOM w0.125: v1(34.85,11.5) 35.245,11.895 U15.8@36.4,11.895